# Allegro board AS003A_20261121-1.brd
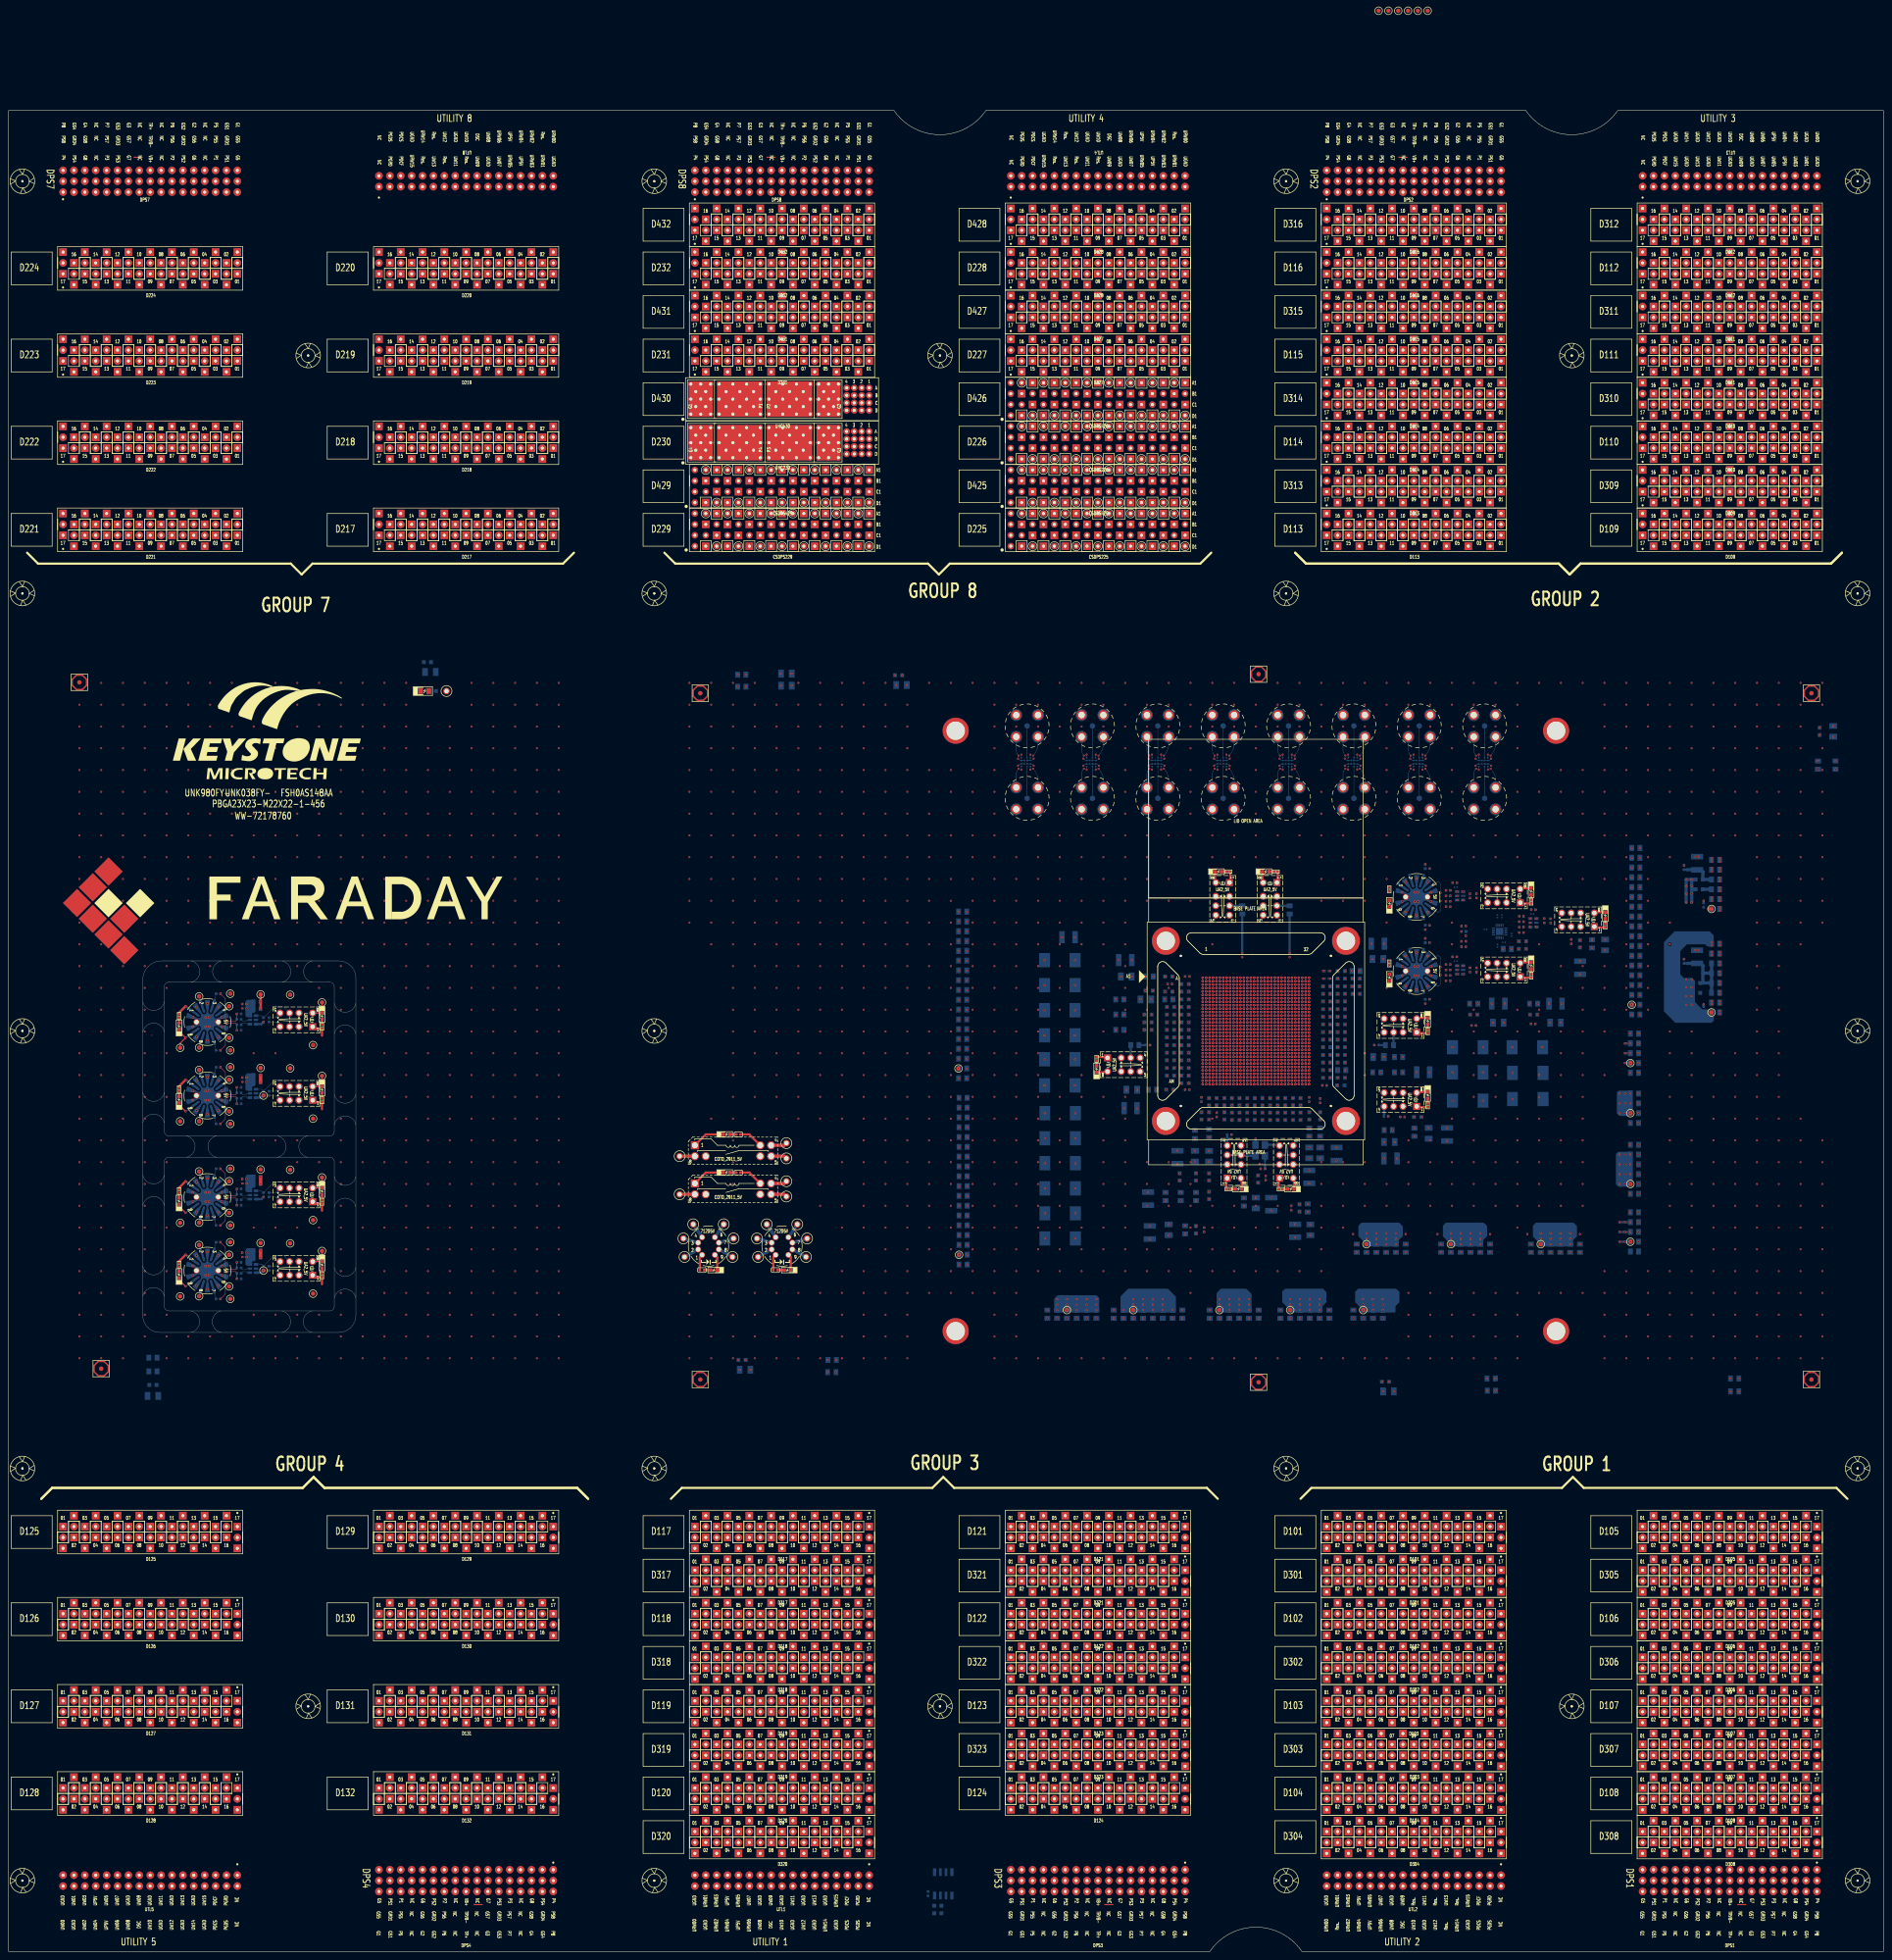
[diagram p0: board, top side]
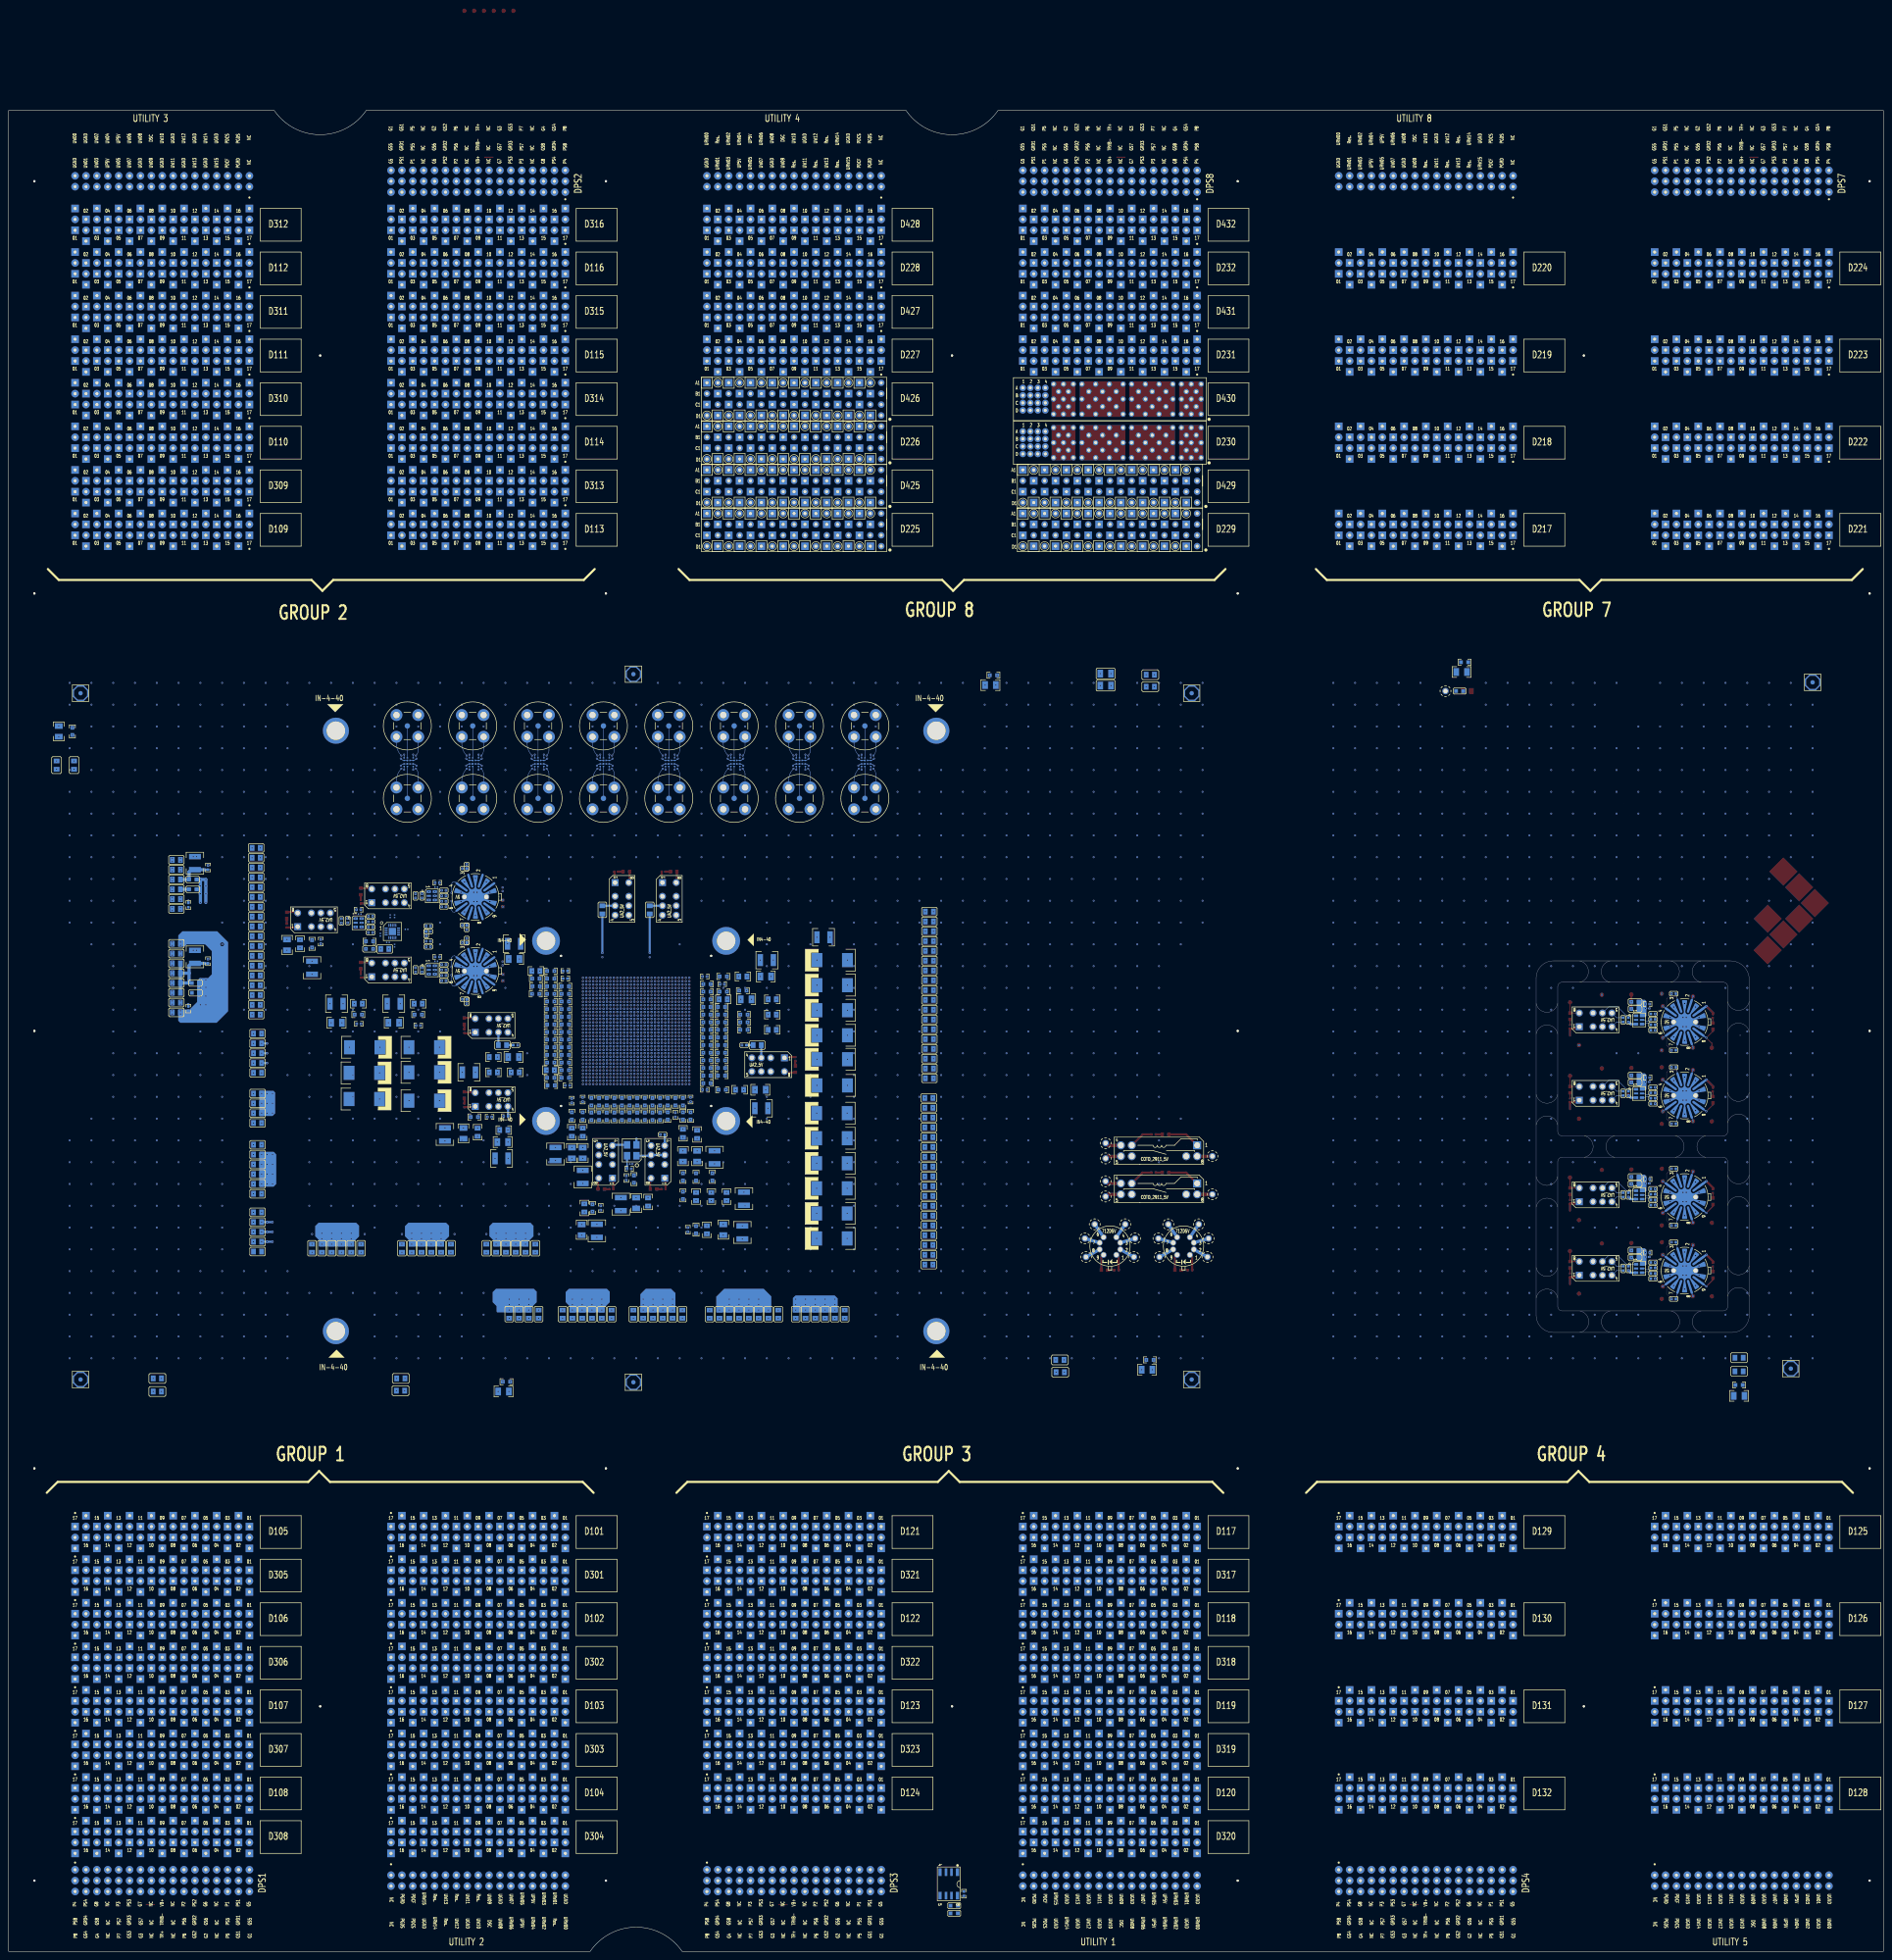
[diagram p1: board, bottom side, seen from below]

Outline 437.15 x 429.26 mm; copper layers: TOP, L02_DGND, L03_DIG, L04_DGND, L05_DIG, L06_DGND, L07_DIG, L08_DGND, L09_DIG, L10_DGND, L11_POWER, L12_POWER, L13_DGND, L14_POWER, L15_POWER, L16_DGND, L17_CBIT, L18_5V, L19_DGND, L20_POWER, L21_DGND, L22_POWER, L23_POWER, L24_DGND, L25_POWER, L26_POWER, L27_DGND, L28_POWER, L29_DGND, L30_DIG, L31_DGND, L32_DIG, L33_DGND, L34_DIG, L35_DGND, BOTTOM. Coordinates in mm from the lower left corner of the outline.
Outline path: 31.29,214.4 arc(33.81,216.46) 36.32,214.4 ; 31.29,193.19 arc(33.81,195.25) 36.32,193.19 ; 31.29,173.96 arc(33.81,176.01) 36.32,173.96 ; 31.29,152.75 arc(33.81,154.8) 36.32,152.75 ; 36.32,221.47 arc(33.81,219.42) 31.29,221.47 ; 36.32,200.26 arc(33.81,198.21) 31.29,200.26 ; 36.32,181.02 arc(33.81,178.97) 31.29,181.02 ; 36.32,159.81 arc(33.81,157.76) 31.29,159.81 ; 41.45,190.16 arc(43.49,187.66) 41.45,185.17 ; 42.49,149.35 arc(44.55,146.84) 42.49,144.32 ; 42.54,230.96 arc(44.58,228.47) 42.54,225.98 ; 48.51,185.17 arc(46.47,187.66) 48.51,190.16 ; 49.56,144.32 arc(47.5,146.84) 49.56,149.35 ; 49.61,225.98 arc(47.58,228.47) 49.61,230.96 ; 62.66,190.16 arc(64.7,187.66) 62.66,185.17 ; 63.7,149.35 arc(65.75,146.84) 63.7,144.32 ; 63.75,230.96 arc(65.79,228.47) 63.75,225.98 ; 69.72,185.17 arc(67.68,187.66) 69.72,190.16 ; 70.77,144.32 arc(68.71,146.84) 70.77,149.35 ; 70.82,225.98 arc(68.78,228.47) 70.82,230.96 ; 75.95,213.97 arc(78.46,216.02) 80.98,213.97 ; 75.95,192.76 arc(78.46,194.81) 80.98,192.76 ; 75.95,173.59 arc(78.46,175.64) 80.98,173.59 ; 75.95,152.38 arc(78.46,154.44) 80.98,152.38 ; 80.98,221.03 arc(78.46,218.98) 75.95,221.03 ; 80.98,199.82 arc(78.46,197.77) 75.95,199.82 ; 80.98,180.66 arc(78.46,178.6) 75.95,180.66 ; 80.98,159.45 arc(78.46,157.4) 75.95,159.45 ; 31.29,226.57 arc(32.58,229.68) 35.69,230.96 76.96,230.96 arc(79.8,229.79) 80.98,226.95 80.98,148.34 arc(79.8,145.5) 76.96,144.32 35.31,144.32 arc(32.47,145.5) 31.29,148.34 31.29,226.57 ; 36.32,224.96 36.32,191.18 arc(36.62,190.46) 37.34,190.16 74.93,190.16 arc(75.65,190.46) 75.95,191.18 75.95,224.96 arc(75.65,225.68) 74.93,225.98 37.34,225.98 arc(36.62,225.68) 36.32,224.96 ; 36.32,184.15 36.32,150.37 arc(36.62,149.65) 37.34,149.35 74.93,149.35 arc(75.65,149.65) 75.95,150.37 75.95,184.15 arc(75.65,184.87) 74.93,185.17 37.34,185.17 arc(36.62,184.87) 36.32,184.15

## Design rules (mm)
net group DIFFPAIR16: nets S1_PCIE_DCH015+ S1_PCIE_DCH015-
net group DIFFPAIR17: nets S1_PCIE_DCH013+ S1_PCIE_DCH013-
net group DIFFPAIR18: nets S1_PCIE_DCH011+ S1_PCIE_DCH011-
net group DIFFPAIR19: nets S1_PCIE_DCH009+ S1_PCIE_DCH009-
net group DIFFPAIR20: nets S1_PCIE_DCH007+ S1_PCIE_DCH007-
net group DIFFPAIR21: nets S1_PCIE_DCH005+ S1_PCIE_DCH005-
net group DIFFPAIR22: nets S1_PCIE_DCH003+ S1_PCIE_DCH003-
net group DIFFPAIR23: nets S1_PCIE_DCH001+ S1_PCIE_DCH001-
net group DIFFPAIR24: nets S1_PCIE_DCH016+ S1_PCIE_DCH016-
net group DIFFPAIR25: nets S1_PCIE_DCH014+ S1_PCIE_DCH014-
net group DIFFPAIR26: nets S1_PCIE_DCH012+ S1_PCIE_DCH012-
net group DIFFPAIR27: nets S1_PCIE_DCH010+ S1_PCIE_DCH010-
net group DIFFPAIR28: nets S1_PCIE_DCH008+ S1_PCIE_DCH008-
net group DIFFPAIR29: nets S1_PCIE_DCH006+ S1_PCIE_DCH006-
net group DIFFPAIR30: nets S1_PCIE_DCH004+ S1_PCIE_DCH004-
net group DIFFPAIR31: nets S1_PCIE_DCH002+ S1_PCIE_DCH002-
net group DIFFPAIR32: nets S1_0_9G_DCH154+ S1_0_9G_DCH154-
net group DIFFPAIR33: nets S1_0_9G_DCH152+ S1_0_9G_DCH152-
net group DIFFPAIR34: nets S1_0_9G_DCH156+ S1_0_9G_DCH156-
net group DIFFPAIR35: nets S1_0_9G_DCH158+ S1_0_9G_DCH158-
net group DIFFPAIR36: nets S1_0_9G_DCH155+ S1_0_9G_DCH155-
net group DIFFPAIR37: nets S1_0_9G_DCH153+ S1_0_9G_DCH153-
net group DIFFPAIR38: nets S1_0_9G_DCH151+ S1_0_9G_DCH151-
net group DIFFPAIR39: nets S1_0_9G_DCH157+ S1_0_9G_DCH157-
net group DIFFPAIR40: nets S1_1_9G_DCH157+ S1_1_9G_DCH157-
net group DIFFPAIR41: nets S1_1_9G_DCH151+ S1_1_9G_DCH151-
net group DIFFPAIR42: nets S1_1_9G_DCH153+ S1_1_9G_DCH153-
net group DIFFPAIR43: nets S1_1_9G_DCH155+ S1_1_9G_DCH155-
net group DIFFPAIR44: nets S1_1_9G_DCH158+ S1_1_9G_DCH158-
net group DIFFPAIR45: nets S1_1_9G_DCH156+ S1_1_9G_DCH156-
net group DIFFPAIR46: nets S1_1_9G_DCH152+ S1_1_9G_DCH152-
net group DIFFPAIR47: nets S1_1_9G_DCH154+ S1_1_9G_DCH154-
net group DIFFPAIR48: nets S1_0A_9G_DCH083+ S1_0A_9G_DCH083-
net group DIFFPAIR49: nets S1_0A_9G_DCH081+ S1_0A_9G_DCH081-
net group DIFFPAIR50: nets S1_EA_9G_DCH073+ S1_EA_9G_DCH073-
net group DIFFPAIR51: nets S1_DA_9G_DCH071+ S1_DA_9G_DCH071-
net group DIFFPAIR52: nets S1_HA_9G_DCH079+ S1_HA_9G_DCH079-
net group DIFFPAIR53: nets S1_GA_9G_DCH077+ S1_GA_9G_DCH077-
net group DIFFPAIR54: nets S1_CA_9G_DCH069+ S1_CA_9G_DCH069-
net group DIFFPAIR55: nets S1_BA_9G_DCH067+ S1_BA_9G_DCH067-
net group DIFFPAIR56: nets S1_FA_9G_DCH075+ S1_FA_9G_DCH075-
net group DIFFPAIR57: nets S1_AA_9G_DCH065+ S1_AA_9G_DCH065-
net group DIFFPAIR58: nets S1_0B_9G_1_DCH082+ S1_0B_9G_1_DCH082-
net group DIFFPAIR59: nets S1_DB_9G_1_DCH072+ S1_DB_9G_1_DCH072-
net group DIFFPAIR60: nets S1_GB_9G_1_DCH078+ S1_GB_9G_1_DCH078-
net group DIFFPAIR61: nets S1_HB_9G_1_DCH080+ S1_HB_9G_1_DCH080-
net group DIFFPAIR62: nets S1_BB_9G_1_DCH068+ S1_BB_9G_1_DCH068-
net group DIFFPAIR63: nets S1_CB_9G_1_DCH070+ S1_CB_9G_1_DCH070-
net group DIFFPAIR64: nets S1_EB_9G_1_DCH074+ S1_EB_9G_1_DCH074-
net group DIFFPAIR65: nets S1_FB_9G_1_DCH076+ S1_FB_9G_1_DCH076-
net group DIFFPAIR66: nets S1_0B_9G_1_DCH084+ S1_0B_9G_1_DCH084-
net group DIFFPAIR67: nets S1_AB_9G_1_DCH066+ S1_AB_9G_1_DCH066-
net group DIFFPAIR68: nets S1_0A_9G_1_DCH083+ S1_0A_9G_1_DCH083-
net group DIFFPAIR69: nets S1_EA_9G_1_DCH073+ S1_EA_9G_1_DCH073-
net group DIFFPAIR70: nets S1_HA_9G_1_DCH079+ S1_HA_9G_1_DCH079-
net group DIFFPAIR71: nets S1_0A_9G_1_DCH081+ S1_0A_9G_1_DCH081-
net group DIFFPAIR72: nets S1_CA_9G_1_DCH069+ S1_CA_9G_1_DCH069-
net group DIFFPAIR73: nets S1_DA_9G_1_DCH071+ S1_DA_9G_1_DCH071-
net group DIFFPAIR74: nets S1_FA_9G_1_DCH075+ S1_FA_9G_1_DCH075-
net group DIFFPAIR75: nets S1_GA_9G_1_DCH077+ S1_GA_9G_1_DCH077-
net group DIFFPAIR76: nets S1_AA_9G_1_DCH065+ S1_AA_9G_1_DCH065-
net group DIFFPAIR77: nets S1_BA_9G_1_DCH067+ S1_BA_9G_1_DCH067-
net group DIFFPAIR78: nets S1_0B_9G_DCH082+ S1_0B_9G_DCH082-
net group DIFFPAIR79: nets S1_HB_9G_DCH080+ S1_HB_9G_DCH080-
net group DIFFPAIR80: nets S1_DB_9G_DCH072+ S1_DB_9G_DCH072-
net group DIFFPAIR81: nets S1_CB_9G_DCH070+ S1_CB_9G_DCH070-
net group DIFFPAIR82: nets S1_GB_9G_DCH078+ S1_GB_9G_DCH078-
net group DIFFPAIR83: nets S1_FB_9G_DCH076+ S1_FB_9G_DCH076-
net group DIFFPAIR84: nets S1_BB_9G_DCH068+ S1_BB_9G_DCH068-
net group DIFFPAIR85: nets S1_AB_9G_DCH066+ S1_AB_9G_DCH066-
net group DIFFPAIR86: nets S1_EB_9G_DCH074+ S1_EB_9G_DCH074-
net group DIFFPAIR87: nets S1_0B_9G_DCH084+ S1_0B_9G_DCH084-
net group S1_OSC4_: nets S1_OSC4_N S1_OSC4_P
net group S1_OSC4_R_: nets S1_OSC4_R_N S1_OSC4_R_P
net group S1_OSC5_: nets S1_OSC5_N S1_OSC5_P
net group S1_OSC5_A_: nets S1_OSC5_A_N S1_OSC5_A_P
net group S1_OSC5_B_: nets S1_OSC5_B_N S1_OSC5_B_P
net group S1_OSC5_C_: nets S1_OSC5_C_N S1_OSC5_C_P
net group S1_OSC6_: nets S1_OSC6_N S1_OSC6_P
net group S1_OSC6_A_: nets S1_OSC6_A_N S1_OSC6_A_P
net group S1_OSC6_B_: nets S1_OSC6_B_N S1_OSC6_B_P
net group S1_OSC6_C_: nets S1_OSC6_C_N S1_OSC6_C_P
net group S1_OSC7_: nets S1_OSC7_N S1_OSC7_P
net group S1_OSC7_A_: nets S1_OSC7_A_N S1_OSC7_A_P
net group S1_OSC7_B_: nets S1_OSC7_B_N S1_OSC7_B_P
net group S1_OSC7_C_: nets S1_OSC7_C_N S1_OSC7_C_P
net group S1_OSC8_: nets S1_OSC8_N S1_OSC8_P
net group S1_OSC8_A_: nets S1_OSC8_A_N S1_OSC8_A_P
net group S1_OSC8_B_: nets S1_OSC8_B_N S1_OSC8_B_P
net group S1_OSC8_C_: nets S1_OSC8_C_N S1_OSC8_C_P
net group S1_PHY0_SYS_CLK1_: nets S1_PHY0_SYS_CLK1_N S1_PHY0_SYS_CLK1_P
net group S1_PHY0_SYS_CLK1R_: nets S1_PHY0_SYS_CLK1R_N S1_PHY0_SYS_CLK1R_P
net group S1_PHY0_SYS_CLK2_: nets S1_PHY0_SYS_CLK2_N S1_PHY0_SYS_CLK2_P
net group S1_PHY0_SYS_CLK3_: nets S1_PHY0_SYS_CLK3_N S1_PHY0_SYS_CLK3_P
net group S1_PHY0_SYS_CLK_: nets S1_PHY0_SYS_CLK_N S1_PHY0_SYS_CLK_P
net group S1_PHY1_SYS_CLK1_: nets S1_PHY1_SYS_CLK1_N S1_PHY1_SYS_CLK1_P
net group S1_PHY1_SYS_CLK1R_: nets S1_PHY1_SYS_CLK1R_N S1_PHY1_SYS_CLK1R_P
net group S1_PHY1_SYS_CLK2_: nets S1_PHY1_SYS_CLK2_N S1_PHY1_SYS_CLK2_P
net group S1_PHY1_SYS_CLK3_: nets S1_PHY1_SYS_CLK3_N S1_PHY1_SYS_CLK3_P
net group S1_PHY1_SYS_CLK_: nets S1_PHY1_SYS_CLK_N S1_PHY1_SYS_CLK_P

## Placement (name value [footprint] x y rotation side)
BD1  BD120-3A-S8-MU  [FB0805]  33.65 138.43 180 bottom
BD2  BD120-3A-S8-MU  [FB0805]  170.94 297.69 180 bottom
BD3  BD120-3A-S8-MU  [FB0805]  170.94 294.89 180 bottom
BD4  BD120-3A-S8-MU  [FB0805]  402.46 133.6 180 bottom
BD5  BD120-3A-S8-MU  [FB0805]  402.46 130.56 180 bottom
BD6  BD120-3A-S8-MU  [FB0805]  192.02 137.92 180 bottom
BD7  BD120-3A-S8-MU  [FB0805]  191.94 135.07 180 bottom
BD8  BD120-3A-S8-MU  [FB0805]  345.69 133.6 180 bottom
BD9  BD120-3A-S8-MU  [FB0805]  345.76 130.75 180 bottom
BD10  BD120-3A-S8-MU  [FB0805]  33.65 135.25 180 bottom
BD11  BD120-3A-S8-MU  [FB0805]  425.96 276.61 90 bottom
BD12  BD120-3A-S8-MU  [FB0805]  421.89 276.61 90 bottom
BD13  BD100-3A-S6-TDK  [FB0603]  393.57 225.81 0 bottom
BD14  BD100-3A-S6-TDK  [FB0603]  393.57 223.52 0 bottom
BD15  BD100-3A-S6-TDK  [FB0603]  394.21 249.94 0 bottom
BD16  BD100-3A-S6-TDK  [FB0603]  394.21 247.65 0 bottom
BD18  BD120-2.5A-S6  [FB0603]  352.99 233.75 180 bottom
BD19  BD100-3A-S6-TDK  [FB0603]  57.91 221.41 180 bottom
BD20  BD100-3A-S6-TDK  [FB0603]  57.91 219.75 180 bottom
BD21  BD100-3A-S6-TDK  [FB0603]  57.91 204.26 180 bottom
BD22  BD100-3A-S6-TDK  [FB0603]  57.91 202.61 180 bottom
BD23  BD100-3A-S6-TDK  [FB0603]  57.91 161.8 180 bottom
BD24  BD100-3A-S6-TDK  [FB0603]  57.91 163.45 180 bottom
BD25  BD100-3A-S6-TDK  [FB0603]  57.91 178.94 180 bottom
BD26  BD100-3A-S6-TDK  [FB0603]  57.91 180.59 180 bottom
C1  0.1U-25-X5R-S2-MU-1  [C0201_UNBGA]  291.23 213.83 270 bottom
C2  0.1U-25-X7R-S4-MU  [C0402]  306.83 201.93 0 bottom
C3  1U-25-X7R-S6-YA  [C0603]  310.64 201.93 0 bottom
C4  4.7U-25-X7R-S8-TY  [C0805]  321.69 191.52 0 bottom
C5  10U-25-X7R-SA  [C1206]  321.94 188.72 0 bottom
C6  22U-25-X7R-SB-MU  [C1210]  322.2 184.91 0 bottom
C7  0.1U-25-X5R-S2-MU-1  [C0201_UNBGA]  288.03 207.43 270 bottom
C8  0.1U-25-X5R-S2-MU-1  [C0201_UNBGA]  291.23 207.43 270 bottom
C9  0.1U-25-X5R-S2-MU-1  [C0201_UNBGA]  289.63 207.43 270 bottom
C10  0.1U-25-X7R-S4-MU  [C0402]  274.83 200.91 0 bottom
C11  1U-25-X7R-S6-YA  [C0603]  270.76 200.91 180 bottom
C12  4.7U-25-X7R-S8-TY  [C0805]  266.7 200.91 180 bottom
C13  10U-25-X7R-SA  [C1206]  261.87 200.91 180 bottom
C14  22U-25-X7R-SB-MU  [C1210]  261.62 196.6 180 bottom
C15  0.1U-25-X5R-S2-MU-1  [C0201_UNBGA]  298.43 222.63 270 bottom
C16  0.1U-25-X5R-S2-MU-1  [C0201_UNBGA]  298.43 221.03 270 bottom
C17  0.1U-25-X5R-S2-MU-1  [C0201_UNBGA]  298.43 219.43 270 bottom
C18  0.1U-25-X5R-S2-MU-1  [C0201_UNBGA]  298.43 217.83 270 bottom
C19  0.1U-25-X5R-S2-MU-1  [C0201_UNBGA]  298.43 216.23 270 bottom
C20  0.1U-25-X5R-S2-MU-1  [C0201_UNBGA]  298.43 214.63 270 bottom
C21  0.1U-25-X5R-S2-MU-1  [C0201_UNBGA]  298.43 213.03 270 bottom
C22  0.1U-25-X5R-S2-MU-1  [C0201_UNBGA]  298.43 211.43 270 bottom
C23  0.1U-25-X5R-S2-MU-1  [C0201_UNBGA]  298.43 209.83 270 bottom
C24  0.1U-25-X5R-S2-MU-1  [C0201_UNBGA]  298.43 208.23 270 bottom
C25  0.1U-25-X5R-S2-MU-1  [C0201_UNBGA]  298.43 206.63 270 bottom
C26  0.1U-25-X5R-S2-MU-1  [C0201_UNBGA]  292.83 218.63 270 bottom
C27  0.1U-25-X5R-S2-MU-1  [C0201_UNBGA]  288.03 218.63 270 bottom
C28  0.1U-25-X5R-S2-MU-1  [C0201_UNBGA]  295.23 217.83 270 bottom
C29  0.1U-25-X5R-S2-MU-1  [C0201_UNBGA]  293.63 217.83 270 bottom
C30  0.1U-25-X5R-S2-MU-1  [C0201_UNBGA]  290.43 217.83 270 bottom
C31  0.1U-25-X5R-S2-MU-1  [C0201_UNBGA]  291.23 218.63 270 bottom
C32  0.1U-25-X5R-S2-MU-1  [C0201_UNBGA]  287.23 217.83 270 bottom
C33  0.1U-25-X5R-S2-MU-1  [C0201_UNBGA]  289.63 217.03 270 bottom
C34  0.1U-25-X5R-S2-MU-1  [C0201_UNBGA]  288.83 217.83 270 bottom
C35  0.1U-25-X5R-S2-MU-1  [C0201_UNBGA]  292.03 217.83 270 bottom
C36  0.1U-25-X5R-S2-MU-1  [C0201_UNBGA]  291.23 217.03 270 bottom
C37  0.1U-25-X5R-S2-MU-1  [C0201_UNBGA]  289.63 218.63 270 bottom
C38  0.1U-25-X5R-S2-MU-1  [C0201_UNBGA]  286.43 218.63 270 bottom
C39  0.1U-25-X5R-S2-MU-1  [C0201_UNBGA]  286.43 220.23 270 bottom
C40  0.1U-25-X5R-S2-MU-1  [C0201_UNBGA]  292.03 219.43 270 bottom
C41  0.1U-25-X5R-S2-MU-1  [C0201_UNBGA]  290.43 219.43 270 bottom
C42  0.1U-25-X5R-S2-MU-1  [C0201_UNBGA]  288.83 219.43 270 bottom
C43  0.1U-25-X5R-S2-MU-1  [C0201_UNBGA]  287.23 219.43 270 bottom
C44  0.1U-25-X5R-S2-MU-1  [C0201_UNBGA]  295.23 219.43 270 bottom
C45  0.1U-25-X5R-S2-MU-1  [C0201_UNBGA]  294.43 220.23 270 bottom
C46  0.1U-25-X5R-S2-MU-1  [C0201_UNBGA]  294.43 218.63 270 bottom
C47  0.1U-25-X5R-S2-MU-1  [C0201_UNBGA]  293.63 219.43 270 bottom
C48  0.1U-25-X5R-S2-MU-1  [C0201_UNBGA]  283.23 221.83 270 bottom
C49  0.1U-25-X5R-S2-MU-1  [C0201_UNBGA]  283.23 213.83 270 bottom
C50  0.1U-25-X5R-S2-MU-1  [C0201_UNBGA]  283.23 215.43 270 bottom
C51  0.1U-25-X5R-S2-MU-1  [C0201_UNBGA]  283.23 217.03 270 bottom
C52  0.1U-25-X5R-S2-MU-1  [C0201_UNBGA]  283.23 218.63 270 bottom
C53  0.1U-25-X5R-S2-MU-1  [C0201_UNBGA]  283.23 220.23 270 bottom
C54  0.1U-25-X5R-S2-MU-1  [C0201_UNBGA]  283.23 207.43 270 bottom
C55  0.1U-25-X5R-S2-MU-1  [C0201_UNBGA]  283.23 209.03 270 bottom
C56  0.1U-25-X5R-S2-MU-1  [C0201_UNBGA]  283.23 210.63 270 bottom
C57  0.1U-25-X5R-S2-MU-1  [C0201_UNBGA]  283.23 212.23 270 bottom
C58  0.1U-25-X5R-S2-MU-1  [C0201_UNBGA]  288.03 215.43 270 bottom
C59  0.1U-25-X5R-S2-MU-1  [C0201_UNBGA]  287.23 216.23 270 bottom
C60  0.1U-25-X5R-S2-MU-1  [C0201_UNBGA]  286.43 217.03 270 bottom
C61  0.1U-25-X5R-S2-MU-1  [C0201_UNBGA]  287.23 211.43 270 bottom
C62  0.1U-25-X5R-S2-MU-1  [C0201_UNBGA]  286.43 212.23 270 bottom
C63  0.1U-25-X5R-S2-MU-1  [C0201_UNBGA]  287.23 213.03 270 bottom
C64  0.1U-25-X5R-S2-MU-1  [C0201_UNBGA]  286.43 213.83 270 bottom
C65  0.1U-25-X5R-S2-MU-1  [C0201_UNBGA]  286.43 215.43 270 bottom
C66  0.1U-25-X5R-S2-MU-1  [C0201_UNBGA]  287.23 208.23 270 bottom
C67  0.1U-25-X5R-S2-MU-1  [C0201_UNBGA]  286.43 209.03 270 bottom
C68  0.1U-25-X5R-S2-MU-1  [C0201_UNBGA]  287.23 209.83 270 bottom
C69  0.1U-25-X5R-S2-MU-1  [C0201_UNBGA]  286.43 210.63 270 bottom
C70  0.1U-25-X5R-S2-MU-1  [C0201_UNBGA]  295.23 211.43 270 bottom
C71  0.1U-25-X5R-S2-MU-1  [C0201_UNBGA]  295.23 213.03 270 bottom
C72  0.1U-25-X5R-S2-MU-1  [C0201_UNBGA]  295.23 216.23 270 bottom
C73  0.1U-25-X5R-S2-MU-1  [C0201_UNBGA]  295.23 209.83 270 bottom
C74  0.1U-25-X5R-S2-MU-1  [C0201_UNBGA]  295.23 208.23 270 bottom
C75  0.1U-25-X5R-S2-MU-1  [C0201_UNBGA]  294.43 209.03 270 bottom
C76  0.1U-25-X5R-S2-MU-1  [C0201_UNBGA]  294.43 215.43 270 bottom
C77  0.1U-25-X5R-S2-MU-1  [C0201_UNBGA]  294.43 213.83 270 bottom
C78  0.1U-25-X5R-S2-MU-1  [C0201_UNBGA]  294.43 212.23 270 bottom
C79  0.1U-25-X5R-S2-MU-1  [C0201_UNBGA]  294.43 210.63 270 bottom
C80  0.1U-25-X5R-S2-MU-1  [C0201_UNBGA]  294.43 217.03 270 bottom
C81  0.1U-25-X5R-S2-MU-1  [C0201_UNBGA]  287.23 214.63 270 bottom
C82  0.1U-25-X5R-S2-MU-1  [C0201_UNBGA]  295.23 214.63 270 bottom
C83  0.1U-25-X5R-S2-MU-1  [C0201_UNBGA]  292.83 207.43 270 bottom
C84  0.1U-25-X5R-S2-MU-1  [C0201_UNBGA]  290.43 213.03 270 bottom
C85  0.1U-25-X5R-S2-MU-1  [C0201_UNBGA]  284.83 210.63 270 bottom
C86  0.1U-25-X5R-S2-MU-1  [C0201_UNBGA]  285.63 211.43 270 bottom
C87  0.1U-25-X5R-S2-MU-1  [C0201_UNBGA]  284.03 211.43 270 bottom
C88  0.1U-25-X5R-S2-MU-1  [C0201_UNBGA]  284.03 208.23 270 bottom
C89  0.1U-25-X5R-S2-MU-1  [C0201_UNBGA]  284.83 218.63 270 bottom
C90  0.1U-25-X5R-S2-MU-1  [C0201_UNBGA]  284.83 209.03 270 bottom
C91  0.1U-25-X5R-S2-MU-1  [C0201_UNBGA]  285.63 208.23 270 bottom
C92  0.1U-25-X5R-S2-MU-1  [C0201_UNBGA]  284.03 219.43 270 bottom
C93  0.1U-25-X5R-S2-MU-1  [C0201_UNBGA]  284.83 215.43 270 bottom
C94  0.1U-25-X5R-S2-MU-1  [C0201_UNBGA]  284.03 216.23 270 bottom
C95  0.1U-25-X5R-S2-MU-1  [C0201_UNBGA]  284.03 217.83 270 bottom
C96  0.1U-25-X5R-S2-MU-1  [C0201_UNBGA]  284.03 221.03 270 bottom
C97  0.1U-25-X5R-S2-MU-1  [C0201_UNBGA]  284.83 220.23 270 bottom
C98  0.1U-25-X5R-S2-MU-1  [C0201_UNBGA]  284.83 213.83 270 bottom
C99  0.1U-25-X5R-S2-MU-1  [C0201_UNBGA]  284.83 221.83 270 bottom
C100  0.1U-25-X5R-S2-MU-1  [C0201_UNBGA]  284.03 209.83 270 bottom
C101  0.1U-25-X5R-S2-MU-1  [C0201_UNBGA]  285.63 209.83 270 bottom
C102  0.1U-25-X5R-S2-MU-1  [C0201_UNBGA]  285.63 216.23 270 bottom
C103  0.1U-25-X5R-S2-MU-1  [C0201_UNBGA]  286.03 207.03 0 bottom
C104  0.1U-25-X5R-S2-MU-1  [C0201_UNBGA]  284.83 207.43 270 bottom
C105  0.1U-25-X5R-S2-MU-1  [C0201_UNBGA]  284.83 217.03 270 bottom
C106  0.1U-25-X5R-S2-MU-1  [C0201_UNBGA]  284.83 212.23 270 bottom
C107  0.1U-25-X5R-S2-MU-1  [C0201_UNBGA]  284.03 213.03 270 bottom
C108  0.1U-25-X5R-S2-MU-1  [C0201_UNBGA]  285.63 213.03 270 bottom
C109  0.1U-25-X5R-S2-MU-1  [C0201_UNBGA]  284.03 214.63 270 bottom
C110  0.1U-25-X5R-S2-MU-1  [C0201_UNBGA]  285.63 214.63 270 bottom
C111  0.1U-25-X5R-S2-MU-1  [C0201_UNBGA]  296.03 212.23 270 bottom
C112  0.1U-25-X5R-S2-MU-1  [C0201_UNBGA]  296.03 213.83 270 bottom
C113  0.1U-25-X5R-S2-MU-1  [C0201_UNBGA]  296.03 209.03 270 bottom
C114  0.1U-25-X5R-S2-MU-1  [C0201_UNBGA]  296.03 210.63 270 bottom
C115  0.1U-25-X5R-S2-MU-1  [C0201_UNBGA]  296.83 209.83 270 bottom
C116  0.1U-25-X5R-S2-MU-1  [C0201_UNBGA]  296.43 207.03 180 bottom
C117  0.1U-25-X5R-S2-MU-1  [C0201_UNBGA]  296.83 208.23 270 bottom
C118  0.1U-25-X5R-S2-MU-1  [C0201_UNBGA]  296.83 211.43 270 bottom
C119  0.1U-25-X5R-S2-MU-1  [C0201_UNBGA]  296.83 213.03 270 bottom
C120  0.1U-25-X5R-S2-MU-1  [C0201_UNBGA]  296.03 215.43 270 bottom
C121  0.1U-25-X5R-S2-MU-1  [C0201_UNBGA]  296.83 214.63 270 bottom
C122  0.1U-25-X5R-S2-MU-1  [C0201_UNBGA]  296.83 216.23 270 bottom
C123  0.1U-25-X5R-S2-MU-1  [C0201_UNBGA]  296.03 217.03 270 bottom
C124  0.1U-25-X5R-S2-MU-1  [C0201_UNBGA]  297.63 207.43 270 bottom
C125  0.1U-25-X5R-S2-MU-1  [C0201_UNBGA]  297.63 209.03 270 bottom
C126  0.1U-25-X5R-S2-MU-1  [C0201_UNBGA]  296.83 217.83 270 bottom
C127  0.1U-25-X5R-S2-MU-1  [C0201_UNBGA]  296.83 219.43 270 bottom
C128  0.1U-25-X5R-S2-MU-1  [C0201_UNBGA]  297.63 210.63 270 bottom
C129  0.1U-25-X5R-S2-MU-1  [C0201_UNBGA]  297.63 220.23 270 bottom
C130  0.1U-25-X5R-S2-MU-1  [C0201_UNBGA]  297.63 221.83 270 bottom
C131  0.1U-25-X5R-S2-MU-1  [C0201_UNBGA]  297.63 212.23 270 bottom
C132  0.1U-25-X5R-S2-MU-1  [C0201_UNBGA]  297.63 215.43 270 bottom
C133  0.1U-25-X5R-S2-MU-1  [C0201_UNBGA]  297.63 213.83 270 bottom
C134  0.1U-25-X5R-S2-MU-1  [C0201_UNBGA]  297.63 217.03 270 bottom
C135  0.1U-25-X5R-S2-MU-1  [C0201_UNBGA]  296.83 221.03 270 bottom
C136  0.1U-25-X5R-S2-MU-1  [C0201_UNBGA]  297.63 218.63 270 bottom
C137  0.1U-25-X7R-S4-MU  [C0402]  321.2 194.71 0 bottom
C138  0.1U-25-X5R-S2-MU-1  [C0201_UNBGA]  290.43 214.63 270 bottom
C139  0.1U-25-X5R-S2-MU-1  [C0201_UNBGA]  290.43 211.43 270 bottom
C140  0.1U-25-X5R-S2-MU-1  [C0201_UNBGA]  288.83 216.23 270 bottom
C141  0.1U-25-X5R-S2-MU-1  [C0201_UNBGA]  290.43 208.23 270 bottom
C142  0.1U-25-X5R-S2-MU-1  [C0201_UNBGA]  290.43 209.83 270 bottom
C143  0.1U-25-X5R-S2-MU-1  [C0201_UNBGA]  288.83 209.83 270 bottom
C144  0.1U-25-X5R-S2-MU-1  [C0201_UNBGA]  288.03 209.03 270 bottom
C145  0.1U-25-X5R-S2-MU-1  [C0201_UNBGA]  291.23 212.23 270 bottom
C146  0.1U-25-X5R-S2-MU-1  [C0201_UNBGA]  288.83 208.23 270 bottom
C147  0.1U-25-X5R-S2-MU-1  [C0201_UNBGA]  289.63 209.03 270 bottom
C148  0.1U-25-X5R-S2-MU-1  [C0201_UNBGA]  289.63 212.23 270 bottom
C149  0.1U-25-X5R-S2-MU-1  [C0201_UNBGA]  288.83 211.43 270 bottom
C150  0.1U-25-X5R-S2-MU-1  [C0201_UNBGA]  288.03 210.63 270 bottom
C151  0.1U-25-X5R-S2-MU-1  [C0201_UNBGA]  289.63 210.63 270 bottom
C152  0.1U-25-X5R-S2-MU-1  [C0201_UNBGA]  288.03 213.83 270 bottom
C153  0.1U-25-X5R-S2-MU-1  [C0201_UNBGA]  288.83 213.03 270 bottom
C154  0.1U-25-X5R-S2-MU-1  [C0201_UNBGA]  289.63 213.83 270 bottom
C155  0.1U-25-X5R-S2-MU-1  [C0201_UNBGA]  288.03 212.23 270 bottom
C156  0.1U-25-X5R-S2-MU-1  [C0201_UNBGA]  291.23 215.43 270 bottom
C157  0.1U-25-X5R-S2-MU-1  [C0201_UNBGA]  293.63 209.83 270 bottom
C158  0.1U-25-X5R-S2-MU-1  [C0201_UNBGA]  293.63 211.43 270 bottom
C159  0.1U-25-X5R-S2-MU-1  [C0201_UNBGA]  289.63 215.43 270 bottom
C160  0.1U-25-X5R-S2-MU-1  [C0201_UNBGA]  288.83 214.63 270 bottom
C161  0.1U-25-X5R-S2-MU-1  [C0201_UNBGA]  292.83 210.63 270 bottom
C162  0.1U-25-X5R-S2-MU-1  [C0201_UNBGA]  292.83 209.03 270 bottom
C163  0.1U-25-X5R-S2-MU-1  [C0201_UNBGA]  293.63 216.23 270 bottom
C164  0.1U-25-X5R-S2-MU-1  [C0201_UNBGA]  293.63 208.23 270 bottom
C165  0.1U-25-X5R-S2-MU-1  [C0201_UNBGA]  292.03 216.23 270 bottom
C166  0.1U-25-X5R-S2-MU-1  [C0201_UNBGA]  292.83 217.03 270 bottom
C167  0.1U-25-X5R-S2-MU-1  [C0201_UNBGA]  292.83 215.43 270 bottom
C168  0.1U-25-X5R-S2-MU-1  [C0201_UNBGA]  292.83 213.83 270 bottom
C169  0.1U-25-X5R-S2-MU-1  [C0201_UNBGA]  292.83 212.23 270 bottom
C170  0.1U-25-X5R-S2-MU-1  [C0201_UNBGA]  292.03 213.03 270 bottom
C171  0.1U-25-X5R-S2-MU-1  [C0201_UNBGA]  292.03 211.43 270 bottom
C172  0.1U-25-X5R-S2-MU-1  [C0201_UNBGA]  292.03 214.63 270 bottom
C173  0.1U-25-X5R-S2-MU-1  [C0201_UNBGA]  293.63 214.63 270 bottom
C174  0.1U-25-X5R-S2-MU-1  [C0201_UNBGA]  291.23 210.63 270 bottom
C175  0.1U-25-X5R-S2-MU-1  [C0201_UNBGA]  291.23 209.03 270 bottom
C176  0.1U-25-X5R-S2-MU-1  [C0201_UNBGA]  292.03 208.23 270 bottom
C177  0.1U-25-X5R-S2-MU-1  [C0201_UNBGA]  293.63 213.03 270 bottom
C178  0.1U-25-X5R-S2-MU-1  [C0201_UNBGA]  292.03 209.83 270 bottom
C179  0.1U-25-X5R-S2-MU-1  [C0201_UNBGA]  288.03 217.03 270 bottom
C180  0.1U-25-X5R-S2-MU-1  [C0201_UNBGA]  290.43 216.23 270 bottom
C181  0.1U-25-X7R-S4-MU  [C0402]  355.47 216.28 180 bottom
C182  1U-25-X7R-S6-YA  [C0603]  355.6 218.44 180 bottom
C183  4.7U-25-X7R-S8-TY  [C0805]  355.6 220.98 180 bottom
C184  10U-25-X7R-SA  [C1206]  360.68 216.53 0 bottom
C185  22U-25-X7R-SB-MU  [C1210]  360.68 220.98 0 bottom
C186  1U-25-X7R-S6-YA  [C0603]  341.63 218.44 180 bottom
C187  0.1U-25-X7R-S4-MU  [C0402]  341.63 215.9 180 bottom
C188  10U-25-X7R-SA  [C1206]  347.34 216.53 0 bottom
C189  4.7U-25-X7R-S8-TY  [C0805]  341.63 220.98 180 bottom
C190  22U-25-X7R-SB-MU  [C1210]  347.34 220.98 0 bottom
C191  1U-25-X7R-S6-YA  [C0603]  270.51 227.33 180 bottom
C192  0.1U-25-X7R-S4-MU  [C0402]  274.83 227.33 180 bottom
C193  10U-25-X7R-SA  [C1206]  260.6 227.33 180 bottom
C194  4.7U-25-X7R-S8-TY  [C0805]  265.94 227.33 180 bottom
C195  22U-25-X7R-SB-MU  [C1210]  260.35 231.14 180 bottom
C196  1U-25-X7R-S6-YA  [C0603]  310.74 228.6 0 bottom
C197  10U-25-X7R-SA  [C1206]  319.28 231.39 0 bottom
C198  0.1U-25-X7R-S4-MU  [C0402]  307.34 228.6 0 bottom
C199  4.7U-25-X7R-S8-TY  [C0805]  314.2 228.6 0 bottom
C200  22U-25-X7R-SB-MU  [C1210]  319.28 234.95 0 bottom
C201  1U-25-X7R-S6-YA  [C0603]  276.86 168.28 270 bottom
C202  0.1U-25-X7R-S4-MU  [C0402]  278.76 168.28 270 bottom
C203  10U-25-X7R-SA  [C1206]  270.51 168.28 270 bottom
C204  4.7U-25-X7R-S8-TY  [C0805]  274.32 168.28 270 bottom
C205  22U-25-X7R-SB-MU  [C1210]  266.06 167.64 270 bottom
C206  1U-25-X7R-S6-YA  [C0603]  305.82 194.82 270 bottom
C207  0.1U-25-X7R-S4-MU  [C0402]  305.82 198.37 270 bottom
C208  10U-25-X7R-SA  [C1206]  305.82 186.18 270 bottom
C209  4.7U-25-X7R-S8-TY  [C0805]  305.82 191.01 270 bottom
C210  22U-25-X7R-SB-MU  [C1210]  309.63 185.93 270 bottom
C211  1U-25-X7R-S6-YA  [C0603]  328.55 194.56 0 bottom
C212  0.1U-25-X7R-S4-MU  [C0402]  324.99 194.56 0 bottom
C213  10U-25-X7R-SA  [C1206]  331.09 190.75 270 bottom
C214  4.7U-25-X7R-S8-TY  [C0805]  327.79 191.01 270 bottom
C215  22U-25-X7R-SB-MU  [C1210]  335.41 190.5 270 bottom
C216  1U-25-X7R-S6-YA  [C0603]  300.99 173.35 270 bottom
C217  10U-25-X7R-SA  [C1206]  303.53 168.25 270 bottom
C218  0.1U-25-X7R-S4-MU  [C0402]  299.08 173.35 270 bottom
C219  4.7U-25-X7R-S8-TY  [C0805]  302.89 173.35 270 bottom
C220  22U-25-X7R-SB-MU  [C1210]  299.97 168.02 270 bottom
C221  10U-25-X7R-SA  [C1206]  303.28 186.18 270 bottom
C222  1U-25-X7R-S6-YA  [C0603]  303.28 194.82 270 bottom
C223  0.1U-25-X7R-S4-MU  [C0402]  303.28 198.63 270 bottom
C224  4.7U-25-X7R-S8-TY  [C0805]  303.28 191.01 270 bottom
C225  22U-25-X7R-SB-MU  [C1210]  303.28 180.59 270 bottom
C226  0.1U-25-X7R-S4-MU  [C0402]  278.13 198.63 270 bottom
C227  1U-25-X7R-S6-YA  [C0603]  278.13 194.82 270 bottom
C228  4.7U-25-X7R-S8-TY  [C0805]  276.61 190.5 270 bottom
C229  10U-25-X7R-SA  [C1206]  276.61 185.42 270 bottom
C230  22U-25-X7R-SB-MU  [C1210]  272.54 185.17 270 bottom
C249  0.1U-25-X7R-S4-MU  [C0402]  337.19 231.9 180 bottom
C250  0.1U-25-X7R-S4-MU  [C0402]  337.19 249.17 180 bottom
C251  0.1U-25-X7R-S4-MU  [C0402]  292.45 182.48 180 bottom
C252  0.22U-16-X7R-S2-PPI  [C0201]  343.87 276.91 0 bottom
C253  0.22U-16-X7R-S2-PPI  [C0201]  343.87 277.7 0 bottom
C254  NC/0.1U-16-X7R-S2-PPI  [C0201]  344.17 276.61 90 bottom
C255  NC/0.1U-16-X7R-S2-PPI  [C0201]  344.17 278 270 bottom
C256  0.22U-16-X7R-S2-PPI  [C0201]  328.63 276.91 0 bottom
C257  0.22U-16-X7R-S2-PPI  [C0201]  328.63 277.7 0 bottom
C258  NC/0.1U-16-X7R-S2-PPI  [C0201]  328.93 276.61 90 bottom
C259  NC/0.1U-16-X7R-S2-PPI  [C0201]  328.93 278 270 bottom
C260  0.22U-16-X7R-S2-PPI  [C0201]  313.39 276.91 0 bottom
C261  0.22U-16-X7R-S2-PPI  [C0201]  313.39 277.7 0 bottom
C262  NC/0.1U-16-X7R-S2-PPI  [C0201]  313.69 278 270 bottom
C263  NC/0.1U-16-X7R-S2-PPI  [C0201]  313.69 276.61 90 bottom
C264  0.22U-16-X7R-S2-PPI  [C0201]  298.15 276.91 0 bottom
C265  0.22U-16-X7R-S2-PPI  [C0201]  298.15 277.7 0 bottom
C266  NC/0.1U-16-X7R-S2-PPI  [C0201]  298.45 278 270 bottom
C267  NC/0.1U-16-X7R-S2-PPI  [C0201]  298.45 276.61 90 bottom
C268  0.22U-16-X7R-S2-PPI  [C0201]  282.91 276.91 0 bottom
C269  0.22U-16-X7R-S2-PPI  [C0201]  282.91 277.7 0 bottom
C270  NC/0.1U-16-X7R-S2-PPI  [C0201]  283.21 278 270 bottom
C271  NC/0.1U-16-X7R-S2-PPI  [C0201]  283.21 276.61 90 bottom
C272  0.22U-16-X7R-S2-PPI  [C0201]  267.67 276.91 0 bottom
C273  0.22U-16-X7R-S2-PPI  [C0201]  267.67 277.7 0 bottom
C274  NC/0.1U-16-X7R-S2-PPI  [C0201]  267.97 278 270 bottom
C275  NC/0.1U-16-X7R-S2-PPI  [C0201]  267.97 276.61 90 bottom
C276  0.22U-16-X7R-S2-PPI  [C0201]  252.43 276.91 0 bottom
C277  0.22U-16-X7R-S2-PPI  [C0201]  252.43 277.7 0 bottom
C278  NC/0.1U-16-X7R-S2-PPI  [C0201]  252.73 278 270 bottom
C279  NC/0.1U-16-X7R-S2-PPI  [C0201]  252.73 276.61 90 bottom
C280  0.22U-16-X7R-S2-PPI  [C0201]  237.19 276.91 0 bottom
C281  0.22U-16-X7R-S2-PPI  [C0201]  237.19 277.7 0 bottom
C282  NC/0.1U-16-X7R-S2-PPI  [C0201]  237.49 278 270 bottom
C283  NC/0.1U-16-X7R-S2-PPI  [C0201]  237.49 276.61 90 bottom
C285  47U-10-X7R-SB-MU  [C1210]  393.7 231.9 90 bottom
C286  0.1U-25-X7R-S4-MU  [C0402]  395.22 219.84 90 bottom
C287  0.1U-25-X7R-S4-MU  [C0402]  390.65 230.89 90 bottom
C288  47U-10-X7R-SB-MU  [C1210]  393.7 253.75 90 bottom
C289  0.1U-25-X7R-S4-MU  [C0402]  395.22 243.97 90 bottom
C290  0.1U-25-X7R-S4-MU  [C0402]  390.65 252.73 90 bottom
C291  1U-25-X7R-S6-YA  [C0603]  366.39 234.95 270 bottom
C292  0.1U-25-X7R-S4-MU  [C0402]  364.36 235.46 270 bottom
C293  4.7U-25-X7R-S8-TY  [C0805]  369.19 234.95 270 bottom
C294  10U-25-X7R-SA  [C1206]  372.24 234.7 270 bottom
C295  22U-25-X7R-SB-MU  [C1210]  366.39 229.36 270 bottom
C296  1U-25-X7R-S6-YA  [C0603]  291.34 180.09 270 bottom
C297  0.1U-25-X7R-S4-MU  [C0402]  293.12 180.34 270 bottom
C298  4.7U-25-X7R-S8-TY  [C0805]  288.04 174.75 270 bottom
C299  10U-25-X7R-SA  [C1206]  290.83 174.5 270 bottom
C300  22U-25-X7R-SB-MU  [C1210]  294.39 174.24 270 bottom
C332  0.47U-25-X5R-S6-SS  [C0603]  270.92 214.88 180 bottom
C333  0.47U-25-X5R-S6-SS  [C0603]  270.92 218.44 180 bottom
C334  0.47U-25-X5R-S6-SS  [C0603]  270.92 216.66 180 bottom
C335  0.47U-25-X5R-S6-SS  [C0603]  270.92 207.77 180 bottom
C336  0.47U-25-X5R-S6-SS  [C0603]  270.92 220.22 180 bottom
C337  0.47U-25-X5R-S6-SS  [C0603]  270.92 211.33 180 bottom
C338  0.47U-25-X5R-S6-SS  [C0603]  270.92 209.55 180 bottom
C339  0.47U-25-X5R-S6-SS  [C0603]  270.92 213.11 180 bottom
C340  10U-25-X-S6-MU  [C0603]  265.68 218.44 180 bottom
C341  10U-25-X-S6-MU  [C0603]  265.68 216.66 180 bottom
C342  10U-25-X-S6-MU  [C0603]  265.68 214.88 180 bottom
C343  470U-4-T-SD-LOESR  [CODE_D]  245.11 231.14 180 bottom
C344  470U-4-T-SD-LOESR  [CODE_D]  245.11 225.3 180 bottom
C345  470U-4-T-SD-LOESR  [CODE_D]  245.11 219.46 180 bottom
C346  0.22U-25-X8R-S6-TDK  [C0603]  274.32 205.99 180 bottom
C347  0.22U-25-X8R-S6-TDK  [C0603]  270.92 204.22 180 bottom
C348  0.22U-25-X8R-S6-TDK  [C0603]  274.32 214.88 180 bottom
C349  0.22U-25-X8R-S6-TDK  [C0603]  274.32 222 180 bottom
C350  0.22U-25-X8R-S6-TDK  [C0603]  274.32 209.55 180 bottom
C351  0.22U-25-X8R-S6-TDK  [C0603]  274.32 218.44 180 bottom
C352  0.22U-25-X8R-S6-TDK  [C0603]  274.32 223.77 180 bottom
C353  0.22U-25-X8R-S6-TDK  [C0603]  274.32 220.22 180 bottom
C354  0.22U-25-X8R-S6-TDK  [C0603]  274.32 225.55 180 bottom
C355  0.22U-25-X8R-S6-TDK  [C0603]  274.32 216.66 180 bottom
C356  0.22U-25-X8R-S6-TDK  [C0603]  274.32 204.22 180 bottom
C357  0.22U-25-X8R-S6-TDK  [C0603]  274.32 207.77 180 bottom
C358  0.22U-25-X8R-S6-TDK  [C0603]  274.32 211.33 180 bottom
C359  0.22U-25-X8R-S6-TDK  [C0603]  274.32 202.44 180 bottom
C360  0.22U-25-X8R-S6-TDK  [C0603]  270.92 205.99 180 bottom
C361  0.22U-25-X8R-S6-TDK  [C0603]  274.32 213.11 180 bottom
C362  NC/10U-25-X-S6-MU  [C0603]  265.94 224.03 180 bottom
C363  NC/470U-4-T-SD-LOESR  [CODE_D]  245.11 208.03 180 bottom
C364  NC/22U-25-X-S8-MU  [C0805]  259.08 214.88 0 bottom
C365  NC/22U-25-X-S8-MU  [C0805]  259.08 218.44 0 bottom
C366  NC/22U-25-X-S8-MU  [C0805]  259.08 222 180 bottom
C367  NC/470U-4-T-SD-LOESR  [CODE_D]  245.11 201.93 180 bottom
C368  NC/470U-4-T-SD-LOESR  [CODE_D]  245.11 213.61 180 bottom
C369  NC/1U-25-X7R-S6-YA  [C0603]  270.51 223.77 180 bottom
C370  NC/0.1U-25-X7R-S4-MU  [C0402]  270.76 225.55 180 bottom
C371  NC/4.7U-25-X7R-S8-TY  [C0805]  270.51 222 180 bottom
C372  NC/10U-25-X7R-SA  [C1206]  265.18 222 180 bottom
C373  NC/22U-25-X7R-SB-MU  [C1210]  247.14 236.47 180 bottom
C374  NC/1U-25-X7R-S6-YA  [C0603]  310.74 207.26 0 bottom
C375  NC/0.1U-25-X7R-S4-MU  [C0402]  307.34 226.82 0 bottom
C376  NC/10U-25-X7R-SA  [C1206]  319.41 208.53 0 bottom
C377  NC/4.7U-25-X7R-S8-TY  [C0805]  310.84 205.49 0 bottom
C378  NC/22U-25-X7R-SB-MU  [C1210]  329.82 204.98 0 bottom
C379  NC/10U-25-X-S6-MU  [C0603]  310.74 203.71 0 bottom
C380  NC/470U-4-T-SD-LOESR  [CODE_D]  340.23 210.82 0 bottom
C381  NC/22U-25-X-S8-MU  [C0805]  319.01 204.98 0 bottom
C382  NC/22U-25-X-S8-MU  [C0805]  324.11 208.53 0 bottom
C383  NC/22U-25-X-S8-MU  [C0805]  324.11 204.98 0 bottom
C384  NC/470U-4-T-SD-LOESR  [CODE_D]  340.23 204.98 0 bottom
C385  NC/470U-4-T-SD-LOESR  [CODE_D]  340.23 198.37 0 bottom
C386  0.47U-25-X5R-S6-SS  [C0603]  310.74 209.04 0 bottom
C387  0.47U-25-X5R-S6-SS  [C0603]  310.74 221.49 0 bottom
C388  0.47U-25-X5R-S6-SS  [C0603]  310.74 219.71 0 bottom
C389  0.47U-25-X5R-S6-SS  [C0603]  310.74 217.93 0 bottom
C390  0.47U-25-X5R-S6-SS  [C0603]  310.74 216.15 0 bottom
C391  0.47U-25-X5R-S6-SS  [C0603]  310.74 214.38 0 bottom
C392  0.47U-25-X5R-S6-SS  [C0603]  310.74 212.6 0 bottom
C393  0.47U-25-X5R-S6-SS  [C0603]  310.74 210.82 0 bottom
C394  10U-25-X-S6-MU  [C0603]  314.13 225.04 0 bottom
C395  470U-4-T-SD-LOESR  [CODE_D]  354.2 204.85 0 bottom
C396  10U-25-X-S6-MU  [C0603]  314.24 223.27 0 bottom
C397  10U-25-X-S6-MU  [C0603]  314.2 226.82 0 bottom
C398  470U-4-T-SD-LOESR  [CODE_D]  354.2 198.75 0 bottom
C399  470U-4-T-SD-LOESR  [CODE_D]  354.11 210.82 0 bottom
C400  0.22U-25-X8R-S6-TDK  [C0603]  307.34 216.15 0 bottom
C401  0.22U-25-X8R-S6-TDK  [C0603]  307.34 214.38 0 bottom
C402  0.22U-25-X8R-S6-TDK  [C0603]  307.34 212.6 0 bottom
C403  0.22U-25-X8R-S6-TDK  [C0603]  310.74 225.04 0 bottom
C404  0.22U-25-X8R-S6-TDK  [C0603]  310.74 223.27 0 bottom
C405  0.22U-25-X8R-S6-TDK  [C0603]  307.34 203.71 0 bottom
C406  0.22U-25-X8R-S6-TDK  [C0603]  307.34 205.49 0 bottom
C407  0.22U-25-X8R-S6-TDK  [C0603]  307.34 210.82 0 bottom
C408  0.22U-25-X8R-S6-TDK  [C0603]  307.34 217.93 0 bottom
C409  0.22U-25-X8R-S6-TDK  [C0603]  307.34 207.26 0 bottom
C410  0.22U-25-X8R-S6-TDK  [C0603]  307.34 209.04 0 bottom
C411  0.22U-25-X8R-S6-TDK  [C0603]  310.74 226.82 0 bottom
C412  0.22U-25-X8R-S6-TDK  [C0603]  307.34 225.04 0 bottom
C413  0.22U-25-X8R-S6-TDK  [C0603]  307.34 223.27 0 bottom
C414  0.22U-25-X8R-S6-TDK  [C0603]  307.34 221.49 0 bottom
C415  0.22U-25-X8R-S6-TDK  [C0603]  307.34 219.71 0 bottom
C416  0.01U-25-X-S2-MU  [C0201]  337.44 230.89 180 bottom
C417  0.01U-25-X-S2-MU  [C0201]  337.44 248.16 180 bottom
C418  0.01U-25-X-S2-MU  [C0201]  292.65 183.61 180 bottom
C419  NC/1U-25-X7R-S6-YA  [C0603]  279.91 194.82 270 bottom
C420  NC/0.1U-25-X7R-S4-MU  [C0402]  281.69 195.07 270 bottom
C421  NC/10U-25-X7R-SA  [C1206]  279.91 185.42 270 bottom
C422  NC/4.7U-25-X7R-S8-TY  [C0805]  279.91 190.75 270 bottom
C423  NC/22U-25-X7R-SB-MU  [C1210]  265.68 175.51 270 bottom
C424  NC/10U-25-X-S6-MU  [C0603]  279.91 176.28 270 bottom
C425  NC/470U-4-T-SD-LOESR  [CODE_D]  245.18 166.24 180 bottom
C426  NC/22U-25-X-S8-MU  [C0805]  276.86 176.02 270 bottom
C427  NC/22U-25-X-S8-MU  [C0805]  269.75 176.02 270 bottom
C428  NC/22U-25-X-S8-MU  [C0805]  273.3 176.02 270 bottom
C429  NC/470U-4-T-SD-LOESR  [CODE_D]  245.18 172.08 180 bottom
C430  NC/470U-4-T-SD-LOESR  [CODE_D]  245.18 177.93 180 bottom
C431  0.47U-25-X5R-S6-SS  [C0603]  292.35 194.72 270 bottom
C432  0.47U-25-X5R-S6-SS  [C0603]  290.58 194.72 270 bottom
C433  0.47U-25-X5R-S6-SS  [C0603]  287.02 194.72 270 bottom
C434  0.47U-25-X5R-S6-SS  [C0603]  295.91 194.72 270 bottom
C435  0.47U-25-X5R-S6-SS  [C0603]  297.69 194.72 270 bottom
C436  0.47U-25-X5R-S6-SS  [C0603]  285.24 194.72 270 bottom
C437  0.47U-25-X5R-S6-SS  [C0603]  294.13 194.72 270 bottom
C438  10U-25-X-S6-MU  [C0603]  273.05 180.59 270 bottom
C439  0.47U-25-X5R-S6-SS  [C0603]  288.8 194.72 270 bottom
C440  470U-4-T-SD-LOESR  [CODE_D]  245.18 195.45 180 bottom
C441  10U-25-X-S6-MU  [C0603]  279.91 180.59 270 bottom
C442  10U-25-X-S6-MU  [C0603]  276.86 180.59 270 bottom
C443  470U-4-T-SD-LOESR  [CODE_D]  245.18 189.61 180 bottom
C444  470U-4-T-SD-LOESR  [CODE_D]  245.18 183.77 180 bottom
C445  0.22U-25-X8R-S6-TDK  [C0603]  287.02 198.12 270 bottom
C446  0.22U-25-X8R-S6-TDK  [C0603]  285.24 198.12 270 bottom
C447  0.22U-25-X8R-S6-TDK  [C0603]  301.24 198.12 270 bottom
C448  0.22U-25-X8R-S6-TDK  [C0603]  281.69 198.12 270 bottom
C449  0.22U-25-X8R-S6-TDK  [C0603]  283.46 198.12 270 bottom
C450  0.22U-25-X8R-S6-TDK  [C0603]  279.91 198.12 270 bottom
C451  0.22U-25-X8R-S6-TDK  [C0603]  294.13 198.12 270 bottom
C452  0.22U-25-X8R-S6-TDK  [C0603]  299.47 198.12 270 bottom
C453  0.22U-25-X8R-S6-TDK  [C0603]  290.58 198.12 270 bottom
C454  0.22U-25-X8R-S6-TDK  [C0603]  283.46 194.82 270 bottom
C455  0.22U-25-X8R-S6-TDK  [C0603]  292.35 198.12 270 bottom
C456  0.22U-25-X8R-S6-TDK  [C0603]  295.91 198.12 270 bottom
C457  0.22U-25-X8R-S6-TDK  [C0603]  297.69 198.12 270 bottom
C458  0.22U-25-X8R-S6-TDK  [C0603]  288.8 198.12 270 bottom
C459  0.22U-25-X8R-S6-TDK  [C0603]  301.24 194.72 270 bottom
C460  0.22U-25-X8R-S6-TDK  [C0603]  299.47 194.72 270 bottom
C461  0.1U-10-X-S2-MU  [C0201]  348.67 235.28 0 bottom
C462  0.1U-10-X-S2-MU  [C0201]  344.36 238.33 180 bottom
C463  0.1U-10-X-S2-MU  [C0201]  347.15 234.52 270 bottom
C464  0.1U-10-X-S2-MU  [C0201]  348.17 241.37 90 bottom
C465  0.1U-10-X-S2-MU  [C0201]  347.15 241.37 90 bottom
C466  0.1U-10-X-S2-MU  [C0201]  350.45 237.06 270 bottom
C467  0.1U-25-X7R-S4-MU  [C0402]  355.53 242.9 0 bottom
C468  0.01U-25-X-S2-MU  [C0201]  355.28 241.88 0 bottom
C469  10U-10-X-S6-MU  [C0603]  352.99 235.53 180 bottom
C470  0.1U-25-X7R-S4-MU  [C0402]  54.99 220.9 180 bottom
C471  0.1U-25-X7R-S4-MU  [C0402]  54.99 203.75 180 bottom
C472  0.01U-25-X-S2-MU  [C0201]  55.09 219.88 180 bottom
C473  0.01U-25-X-S2-MU  [C0201]  55.09 202.74 180 bottom
C474  0.1U-25-X7R-S4-MU  [C0402]  54.99 162.94 180 bottom
C475  0.01U-25-X-S2-MU  [C0201]  55.09 161.93 180 bottom
C476  0.1U-25-X7R-S4-MU  [C0402]  54.99 180.09 180 bottom
C477  0.01U-25-X-S2-MU  [C0201]  55.09 179.07 180 bottom
CB1  0.1U-25-X-S6  [C0603]  171.02 137.92 180 bottom
CB2  10U-25-X7R-SA  [C1206]  171.7 135.64 180 bottom
CB3  0.1U-25-X-S6  [C0603]  321.06 132.84 180 bottom
CB4  10U-25-X7R-SA  [C1206]  321.74 130.55 180 bottom
CB5  0.1U-25-X-S6  [C0603]  422.27 284.48 270 bottom
CB6  10U-25-X7R-SA  [C1206]  425.45 284.48 270 bottom
CB7  0.1U-25-X-S6  [C0603]  207.52 297.56 180 bottom
CB8  10U-25-X7R-SA  [C1206]  208.21 295.27 180 bottom
CB9  0.1U-25-X-S6  [C0603]  33.65 132.08 180 bottom
CB10  10U-25-X7R-SA  [C1206]  33.65 129.54 180 bottom
CB15  0.1U-25-X-S6  [C0603]  97.66 300.61 180 bottom
CB16  10U-25-X7R-SA  [C1206]  98.35 298.32 180 bottom
CSDPS225  V93K_CSDPS_DPS32  [PG_VG93K_PF_DPS32_G8D225]  254 331.47 0 top
CSDPS226  V93K_CSDPS  [PG_VG93K_PF_DPS32_G8D226]  254 351.79 0 top
CSDPS229  V93K_CSDPS_DPS32  [PG_VG93K_PF_DPS32_G8D229]  180.34 331.47 0 top
CSDPS425  V93K_CSDPS_DPS32  [PG_VG93K_PF_DPS32_G8D425]  254 341.63 0 top
CSDPS426  V93K_CSDPS  [PG_VG93K_PF_DPS32_G8D426]  254 361.95 0 top
CSDPS429  V93K_CSDPS_DPS32  [PG_VG93K_PF_DPS32_G8D429]  180.34 341.63 0 top
D101  V93K_CH  [PG_VG93K_F_G1D101]  327.66 97.79 0 top
D102  V93K_CH  [PG_VG93K_F_G1D102]  327.66 77.47 0 top
D103  V93K_CH  [PG_VG93K_F_G1D103]  327.66 57.15 0 top
D104  V93K_CH  [PG_VG93K_F_G1D104]  327.66 36.83 0 top
D105  V93K_CH  [PG_VG93K_F_G1D105]  401.32 97.79 0 top
D106  V93K_CH  [PG_VG93K_F_G1D106]  401.32 77.47 0 top
D107  V93K_CH  [PG_VG93K_F_G1D107]  401.32 57.15 0 top
D108  V93K_CH  [PG_VG93K_F_G1D108]  401.32 36.83 0 top
D109  V93K_CH  [PG_VG93K_F_G2D109]  401.32 331.47 0 top
D110  V93K_CH  [PG_VG93K_F_G2D110]  401.32 351.79 0 top
D111  V93K_CH  [PG_VG93K_F_G2D111]  401.32 372.11 0 top
D112  V93K_CH  [PG_VG93K_F_G2D112]  401.32 392.43 0 top
D113  V93K_CH  [PG_VG93K_F_G2D113]  327.66 331.47 0 top
D114  V93K_CH  [PG_VG93K_F_G2D114]  327.66 351.79 0 top
D115  V93K_CH  [PG_VG93K_F_G2D115]  327.66 372.11 0 top
D116  V93K_CH  [PG_VG93K_F_G2D116]  327.66 392.43 0 top
D117  V93K_CH  [PG_VG93K_F_G3D117]  180.34 97.79 0 top
D118  V93K_CH  [PG_VG93K_F_G3D118]  180.34 77.47 0 top
D119  V93K_CH  [PG_VG93K_F_G3D119]  180.34 57.15 0 top
D120  V93K_CH  [PG_VG93K_F_G3D120]  180.34 36.83 0 top
D121  V93K_CH  [PG_VG93K_F_G3D121]  254 97.79 0 top
D122  V93K_CH  [PG_VG93K_F_G3D122]  254 77.47 0 top
D123  V93K_CH  [PG_VG93K_F_G3D123]  254 57.15 0 top
D124  V93K_CH  [PG_VG93K_F_G3D124]  254 36.83 0 top
D125  V93K_CH  [PG_VG93K_F_G4D125]  33.02 97.79 0 top
D126  V93K_CH  [PG_VG93K_F_G4D126]  33.02 77.47 0 top
D127  V93K_CH  [PG_VG93K_F_G4D127]  33.02 57.15 0 top
D128  V93K_CH  [PG_VG93K_F_G4D128]  33.02 36.83 0 top
D129  V93K_CH  [PG_VG93K_F_G4D129]  106.68 97.79 0 top
D130  V93K_CH  [PG_VG93K_F_G4D130]  106.68 77.47 0 top
D131  V93K_CH  [PG_VG93K_F_G4D131]  106.68 57.15 0 top
D132  V93K_CH  [PG_VG93K_F_G4D132]  106.68 36.83 0 top
D217  V93K_CH  [PG_VG93K_F_G7D217]  106.68 331.47 0 top
D218  V93K_CH  [PG_VG93K_F_G7D218]  106.68 351.79 0 top
D219  V93K_CH  [PG_VG93K_F_G7D219]  106.68 372.11 0 top
D220  V93K_CH  [PG_VG93K_F_G7D220]  106.68 392.43 0 top
D221  V93K_CH  [PG_VG93K_F_G7D221]  33.02 331.47 0 top
D222  V93K_CH  [PG_VG93K_F_G7D222]  33.02 351.79 0 top
D223  V93K_CH  [PG_VG93K_F_G7D223]  33.02 372.11 0 top
D224  V93K_CH  [PG_VG93K_F_G7D224]  33.02 392.43 0 top
D227  V93K_CH  [PG_VG93K_F_G8D227]  254 372.11 0 top
D228  V93K_CH  [PG_VG93K_F_G8D228]  254 392.43 0 top
D231  V93K_CH  [PG_VG93K_F_G8D231]  180.34 372.11 0 top
D232  V93K_CH  [PG_VG93K_F_G8D232]  180.34 392.43 0 top
D301  V93K_CH  [PG_VG93K_F_G1D301]  327.66 87.63 0 top
D302  V93K_CH  [PG_VG93K_F_G1D302]  327.66 67.31 0 top
D303  V93K_CH  [PG_VG93K_F_G1D303]  327.66 46.99 0 top
D304  V93K_CH  [PG_VG93K_F_G1D304]  327.66 26.67 0 top
D305  V93K_CH  [PG_VG93K_F_G1D305]  401.32 87.63 0 top
D306  V93K_CH  [PG_VG93K_F_G1D306]  401.32 67.31 0 top
D307  V93K_CH  [PG_VG93K_F_G1D307]  401.32 46.99 0 top
D308  V93K_CH  [PG_VG93K_F_G1D308]  401.32 26.67 0 top
D309  V93K_CH  [PG_VG93K_F_G2D309]  401.32 341.63 0 top
D310  V93K_CH  [PG_VG93K_F_G2D310]  401.32 361.95 0 top
D311  V93K_CH  [PG_VG93K_F_G2D311]  401.32 382.27 0 top
D312  V93K_CH  [PG_VG93K_F_G2D312]  401.32 402.59 0 top
D313  V93K_CH  [PG_VG93K_F_G2D313]  327.66 341.63 0 top
D314  V93K_CH  [PG_VG93K_F_G2D314]  327.66 361.95 0 top
D315  V93K_CH  [PG_VG93K_F_G2D315]  327.66 382.27 0 top
D316  V93K_CH  [PG_VG93K_F_G2D316]  327.66 402.59 0 top
D317  V93K_CH  [PG_VG93K_F_G3D317]  180.34 87.63 0 top
D318  V93K_CH  [PG_VG93K_F_G3D318]  180.34 67.31 0 top
D319  V93K_CH  [PG_VG93K_F_G3D319]  180.34 46.99 0 top
D320  V93K_CH  [PG_VG93K_F_G3D320]  180.34 26.67 0 top
D321  V93K_CH  [PG_VG93K_F_G3D321]  254 87.63 0 top
D322  V93K_CH  [PG_VG93K_F_G3D322]  254 67.31 0 top
D323  V93K_CH  [PG_VG93K_F_G3D323]  254 46.99 0 top
D427  V93K_CH  [PG_VG93K_F_G8D427]  254 382.27 0 top
D428  V93K_CH  [PG_VG93K_F_G8D428]  254 402.59 0 top
D431  V93K_CH  [PG_VG93K_F_G8D431]  180.34 382.27 0 top
D432  V93K_CH  [PG_VG93K_F_G8D432]  180.34 402.59 0 top
DPS1  V93K_DPS  [PG_VG93K_F_G1DPS1]  401.32 16.51 0 top
DPS2  V93K_DPS  [PG_VG93K_F_G2DPS2]  327.66 412.75 0 top
DPS3  V93K_DPS  [PG_VG93K_F_G3DPS3]  254 16.51 0 top
DPS4  V93K_DPS  [PG_VG93K_F_G4DPS4]  106.68 16.51 0 top
DPS7  V93K_DPS  [PG_VG93K_F_G7DPS7]  33.02 412.75 0 top
DPS8  V93K_DPS  [PG_VG93K_F_G8DPS8]  180.34 412.75 0 top
DUT_GND  TP01  [TP_040_T]  319.44 452.5 0 top
DUT_GND1  TP01  [TP_040_T]  321.73 452.5 0 top
DUT_GND2  TP01  [TP_040_T]  324.02 452.5 0 top
DUT_GND3  TP01  [TP_040_T]  326.3 452.5 0 top
DUT_GND4  TP01  [TP_040_T]  328.59 452.5 0 top
DUT_GND5  TP01  [TP_040_T]  330.87 452.5 0 top
DV2  LDG-2-S6  [LED_0603]  321.94 227.08 90 top
DV3  LDG-2-S6  [LED_0603]  321.94 244.35 90 top
DV4  LDG-2-S6  [LED_0603]  293.1 251.77 0 top
DV5  LDG-2-S6  [LED_0603]  282.05 251.77 0 top
DV6  LDG-2-S6  [LED_0603]  253.69 205.73 90 top
DV7  LDG-2-S6  [LED_0603]  330.89 216.93 270 top
DV8  LDG-2-S6  [LED_0603]  298.97 177.75 180 top
DV9  LDG-2-S6  [LED_0603]  330.89 199.66 270 top
DV10  LDG-2-S6  [LED_0603]  286.78 177.75 180 top
DV11  LDG-2-S6  [LED_0603]  355.02 229.88 270 top
DV12  LDG-2-S6  [LED_0603]  355.02 247.15 270 top
DV13  LDG-2-S6  [LED_0603]  372.29 241.57 270 top
DV14  LDG-2-S6  [LED_0603]  73.08 218.07 270 top
DV15  LDG-2-S6  [LED_0603]  73.08 200.92 270 top
DV16  LDG-2-S6  [LED_0603]  39.75 215.73 90 top
DV17  LDG-2-S6  [LED_0603]  39.75 198.58 90 top
DV18  LDG-2-S6  [LED_0603]  73.08 160.11 270 top
DV19  LDG-2-S6  [LED_0603]  39.75 157.77 90 top
DV20  LDG-2-S6  [LED_0603]  73.08 177.25 270 top
DV21  LDG-2-S6  [LED_0603]  39.75 174.92 90 top
FD1  -  [FD_040_V2]  21.59 135.89 0 top
FD2  -  [FD_040_V2]  161.29 133.35 0 top
FD3  -  [FD_040_V2]  420.37 133.35 0 top
FD4  -  [FD_040_V2]  291.46 132.71 0 top
FD5  -  [FD_040_V2]  291.46 297.81 0 top
FD6  -  [FD_040_V2]  420.37 293.37 0 top
FD7  -  [FD_040_V2]  161.29 293.37 0 top
FD8  -  [FD_040_V2]  16.51 295.91 0 top
FD9  -  [FD_040_V2]  21.59 135.89 180 bottom
FD10  -  [FD_040_V2]  161.29 133.35 180 bottom
FD11  -  [FD_040_V2]  420.37 133.35 180 bottom
FD12  -  [FD_040_V2]  291.46 132.71 180 bottom
FD13  -  [FD_040_V2]  291.46 297.81 180 bottom
FD14  -  [FD_040_V2]  420.37 293.37 180 bottom
FD15  -  [FD_040_V2]  161.29 293.37 180 bottom
FD16  -  [FD_040_V2]  16.51 295.91 180 bottom
FSH0AS148AA  REF-CODE-CHIP  [CHIP_CODE]  69.34 270.26 0 top
K1  SGRF303-5-A  [RL_SGRF303_5V]  328.29 228.6 90 bottom
K2  SGRF303-5-A  [RL_SGRF303_5V]  328.29 245.87 90 bottom
K3  UA2-5NJ-A-V3  [RL_NECUA2_5V_V3]  294.13 245.62 90 bottom
K4  UA2-5NJ-A-V3  [RL_NECUA2_5V_V3]  283.08 245.62 90 bottom
K5  UA2-5NJ-A-V3  [RL_NECUA2_5V_V3]  259.84 206.76 180 bottom
K6  UA2-5NJ-A-V3  [RL_NECUA2_5V_V3]  324.74 215.9 0 bottom
K7  UA2-5NJ-A-V3  [RL_NECUA2_5V_V3]  297.94 183.9 270 bottom
K8  UA2-5NJ-A-V3  [RL_NECUA2_5V_V3]  324.74 198.63 0 bottom
K9  UA2-5NJ-A-V3  [RL_NECUA2_5V_V3]  285.75 183.9 270 bottom
K10  UA2-5NJ-A-V3  [RL_NECUA2_5V_V3]  348.87 228.85 0 bottom
K11  UA2-5NJ-A-V3  [RL_NECUA2_5V_V3]  348.87 246.13 0 bottom
K12  UA2-5NJ-A-V3  [RL_NECUA2_5V_V3]  366.14 240.54 0 bottom
K13  UA2-5NJ-A-V3  [RL_NECUA2_5V_V3]  67.31 217.21 0 bottom
K14  UA2-5NJ-A-V3  [RL_NECUA2_5V_V3]  67.31 200.07 0 bottom
K15  SGRF303-5-A  [RL_SGRF303_5V]  46.35 216.71 90 bottom
K16  SGRF303-5-A  [RL_SGRF303_5V]  46.35 199.56 90 bottom
K17  UA2-5NJ-A-V3  [RL_NECUA2_5V_V3]  67.31 159.26 0 bottom
K18  SGRF303-5-A  [RL_SGRF303_5V]  46.35 158.75 90 bottom
K19  UA2-5NJ-A-V3  [RL_NECUA2_5V_V3]  67.31 176.4 0 bottom
K20  SGRF303-5-A  [RL_SGRF303_5V]  46.35 175.89 90 bottom
KS1  NC/712D-5-V2  [RL_712D_5V_V2]  163.19 164.47 180 bottom
KS1-2  TP03-D  [TP_060_040]  157.61 161.93 0 top
KS1-3  TP03-D  [TP_060_040]  157.35 166.24 0 top
KS1-4  TP03-D  [TP_060_040]  159.64 169.54 0 top
KS1-6  TP03-D  [TP_060_040]  166.75 169.54 0 top
KS1-7  TP03-D  [TP_060_040]  169.04 166.24 0 top
KS1-8  TP03-D  [TP_060_040]  168.78 161.93 0 top
KS2  NC/712D-5-V2  [RL_712D_5V_V2]  180.34 164.47 180 bottom
KS2-2  TP03-D  [TP_060_040]  174.75 161.93 0 top
KS2-3  TP03-D  [TP_060_040]  174.5 166.24 0 top
KS2-4  TP03-D  [TP_060_040]  176.78 169.54 0 top
KS2-6  TP03-D  [TP_060_040]  183.9 169.54 0 top
KS2-7  TP03-D  [TP_060_040]  186.18 166.24 0 top
KS2-8  TP03-D  [TP_060_040]  185.93 161.93 0 top
KS3  NC/2911-05-321-A-V2  [RL_COTO2911_5V_RLPIN]  177.8 187.96 180 bottom
KS3-4  TP03-D  [TP_060_040]  181.36 188.47 0 top
KS3-5  TP03-D  [TP_060_040]  181.36 184.91 0 top
KS3-8  TP03-D  [TP_060_040]  156.46 185.42 0 top
KS4  NC/2911-05-321-A-V2  [RL_COTO2911_5V_RLPIN]  177.8 179.07 180 bottom
KS4-4  TP03-D  [TP_060_040]  181.36 179.58 0 top
KS4-5  TP03-D  [TP_060_040]  181.36 176.02 0 top
KS4-8  TP03-D  [TP_060_040]  156.46 176.53 0 top
LDB1  LDG-2-S6  [LED_0603]  164.46 158.88 180 top
LDB2  LDG-2-S6  [LED_0603]  181.61 158.88 180 top
LDB3  LDG-2-S6  [LED_0603]  167.39 190.5 0 top
LDB4  LDG-2-S6  [LED_0603]  167.39 181.61 0 top
LDB5  LDG-2-S8  [LED_0805]  97.03 293.88 0 top
LOGO1  -  [LOGO_KT_KSMT]  57.15 277.62 0 top
LOGO2  LOGO_FY_Faraday  [LOGO_FY_FARADAY]  64.26 240.79 0 top
LRB1  470-1-S4  [R0402]  161.67 158.88 0 top
LRB2  470-1-S4  [R0402]  178.82 158.88 0 top
LRB3  470-1-S4  [R0402]  170.18 190.5 180 top
LRB4  470-1-S4  [R0402]  170.18 181.61 180 top
LRB5  330-1-S6  [R0603]  98.81 293.88 0 bottom
M1  V93K-TOUCHSENSOR-FY  [V93K_TOUCHSENSOR_FY]  290.83 214.63 0 top
NOREF  -  []  283.78 220.51 90 top
NOREF#2  -  []  163.07 158.23 90 top
NOREF#3  -  []  67.71 218.81 0 top
NOREF#4  -  []  290.98 216.51 0 top
NOREF#5  -  []  309.89 219.26 90 top
NOREF#6  -  []  282.98 208.51 90 top
NOREF#7  -  []  47.59 195.77 90 top
NOREF#8  -  []  313.37 277.4 90 top
NOREF#9  -  []  309.89 210.37 90 top
NOREF#10  -  []  266.06 166.12 90 top
NOREF#11  -  []  355.02 244.35 90 top
NOREF#12  -  []  287.23 207.93 90 top
NOREF#13  -  []  288.83 211.13 90 top
NOREF#14  -  []  57.95 215.92 90 top
NOREF#15  -  []  309.89 228.15 90 top
NOREF#16  -  []  346.83 233.92 90 top
NOREF#17  -  []  253.69 207.68 90 top
NOREF#18  -  []  298.18 206.11 0 top
NOREF#19  -  []  275.17 219.77 90 top
NOREF#20  -  []  295.23 209.53 90 top
NOREF#21  -  []  286.57 198.97 0 top
NOREF#22  -  []  344.47 277.38 90 top
NOREF#23  -  []  292.26 252.22 0 top
NOREF#24  -  []  267.07 277.38 0 top
NOREF#25  -  []  296.14 185.5 0 top
NOREF#26  -  []  329.69 277.7 90 top
NOREF#27  -  []  31.29 152.75 0 top
NOREF#28  -  []  286.18 214.91 90 top
NOREF#29  -  []  290.75 188.07 0 top
NOREF#30  -  []  297.55 277.38 0 top
NOREF#31  -  []  286.18 210.11 90 top
NOREF#32  -  []  298.18 209.31 0 top
NOREF#33  -  []  301.24 178.05 90 top
NOREF#34  -  []  291.13 250.87 0 top
NOREF#35  -  []  251.83 276.59 0 top
NOREF#36  -  []  291.78 210.91 0 top
NOREF#37  -  []  267.97 277.7 90 top
NOREF#38  -  []  61.66 214.21 0 top
NOREF#39  -  []  365.95 235.8 0 top
NOREF#40  -  []  306.49 208.59 90 top
NOREF#41  -  []  234.95 266.32 0 top
NOREF#42  -  []  294.98 210.91 0 top
NOREF#43  -  []  294.43 208.73 90 top
NOREF#44  -  []  279.08 247.22 0 top
NOREF#45  -  []  55.48 157.64 90 top
NOREF#46  -  []  266.79 223.58 90 top
NOREF#47  -  []  346.71 283.21 90 top
NOREF#48  -  []  73.08 215.18 90 top
NOREF#49  -  []  293.63 217.53 90 top
NOREF#50  -  []  303.23 225.43 90 top
NOREF#51  -  []  275.17 201.99 90 top
NOREF#52  -  []  63.31 160.86 0 top
NOREF#53  -  []  284.83 216.73 90 top
NOREF#54  -  []  291.78 210.91 90 top
NOREF#55  -  []  294.18 214.91 0 top
NOREF#56  -  []  292.03 214.33 90 top
NOREF#57  -  []  345.26 277.4 90 top
NOREF#58  -  []  289.38 208.51 90 top
NOREF#59  -  []  354.63 243.98 90 top
NOREF#60  -  []  309.89 206.81 90 top
NOREF#61  -  []  293.38 209.31 90 top
NOREF#62  -  []  292.58 218.11 0 top
NOREF#63  -  []  288.58 215.71 90 top
NOREF#64  -  []  282.98 218.11 0 top
NOREF#65  -  []  330.89 214.12 90 top
NOREF#66  -  []  283.78 214.11 90 top
NOREF#67  -  []  292.83 208.73 90 top
NOREF#68  -  []  344.17 277.7 90 top
NOREF#69  -  []  56.28 217.19 90 top
NOREF#70  -  []  289.38 216.51 0 top
NOREF#71  -  []  56.28 200.05 90 top
NOREF#72  -  []  298.13 277.21 0 top
NOREF#73  -  []  311.15 266.32 0 top
NOREF#74  -  []  342.81 276.31 90 top
NOREF#75  -  []  73.08 159.36 90 top
NOREF#76  -  []  47.2 194.55 0 top
NOREF#77  -  []  40.14 200.17 90 top
NOREF#78  -  []  297.24 198.97 0 top
NOREF#79  -  []  325.14 200.23 0 top
NOREF#80  -  []  294.18 211.71 90 top
NOREF#81  -  []  345.82 220.98 0 top
NOREF#82  -  []  371.9 238.4 90 top
NOREF#83  -  []  347.15 241.07 90 top
NOREF#84  -  []  72.69 197.67 0 top
NOREF#85  -  []  163.61 158.43 0 top
NOREF#86  -  []  321.94 229.95 90 top
NOREF#87  -  []  288.58 207.71 0 top
NOREF#88  -  []  292.83 210.33 90 top
NOREF#89  -  []  290.43 207.93 90 top
NOREF#90  -  []  292.83 218.33 90 top
NOREF#91  -  []  352.47 244.53 90 top
NOREF#92  -  []  289.63 218.33 90 top
